# Allegro board LAY-90841_A4.brd
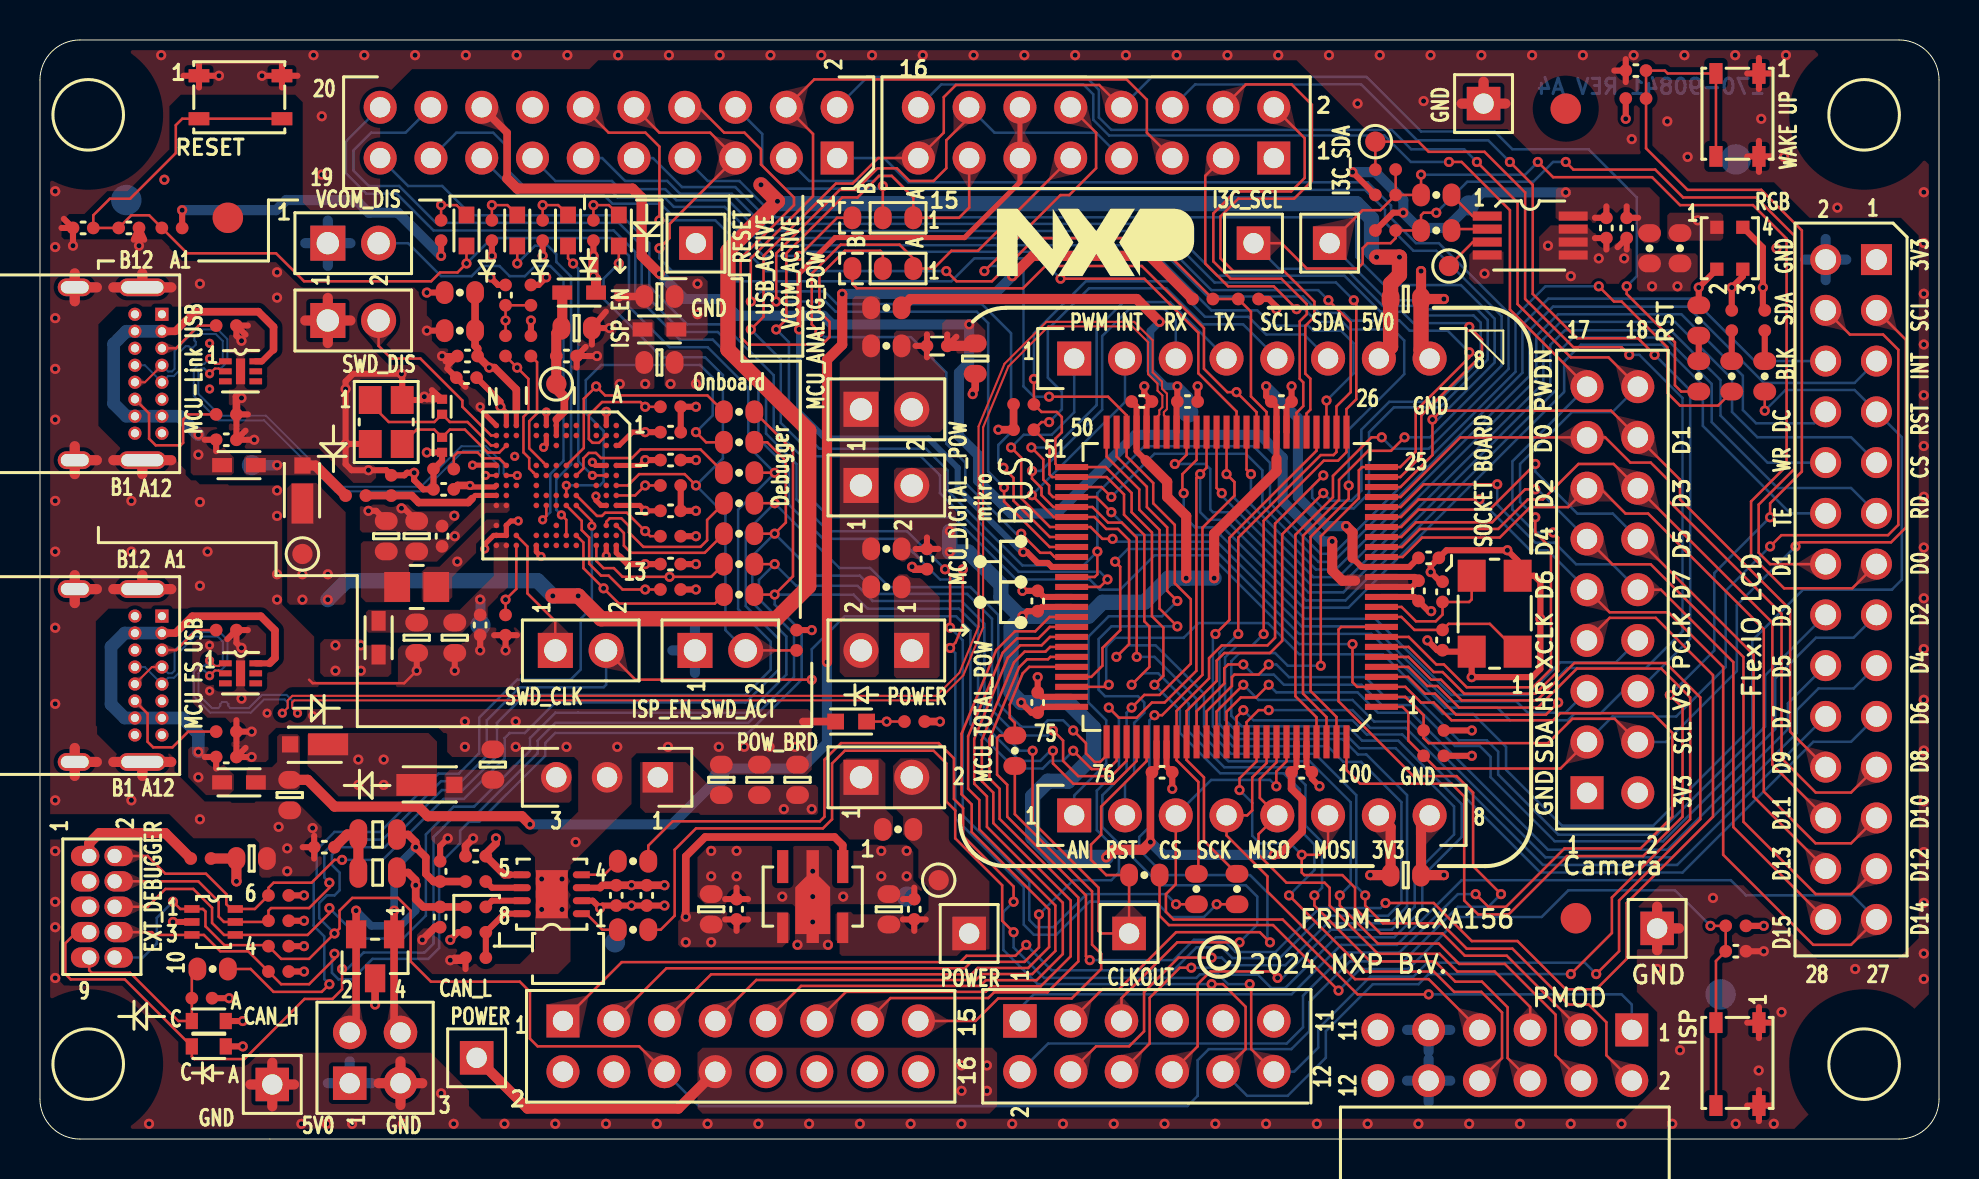
[diagram p0: board, top side]
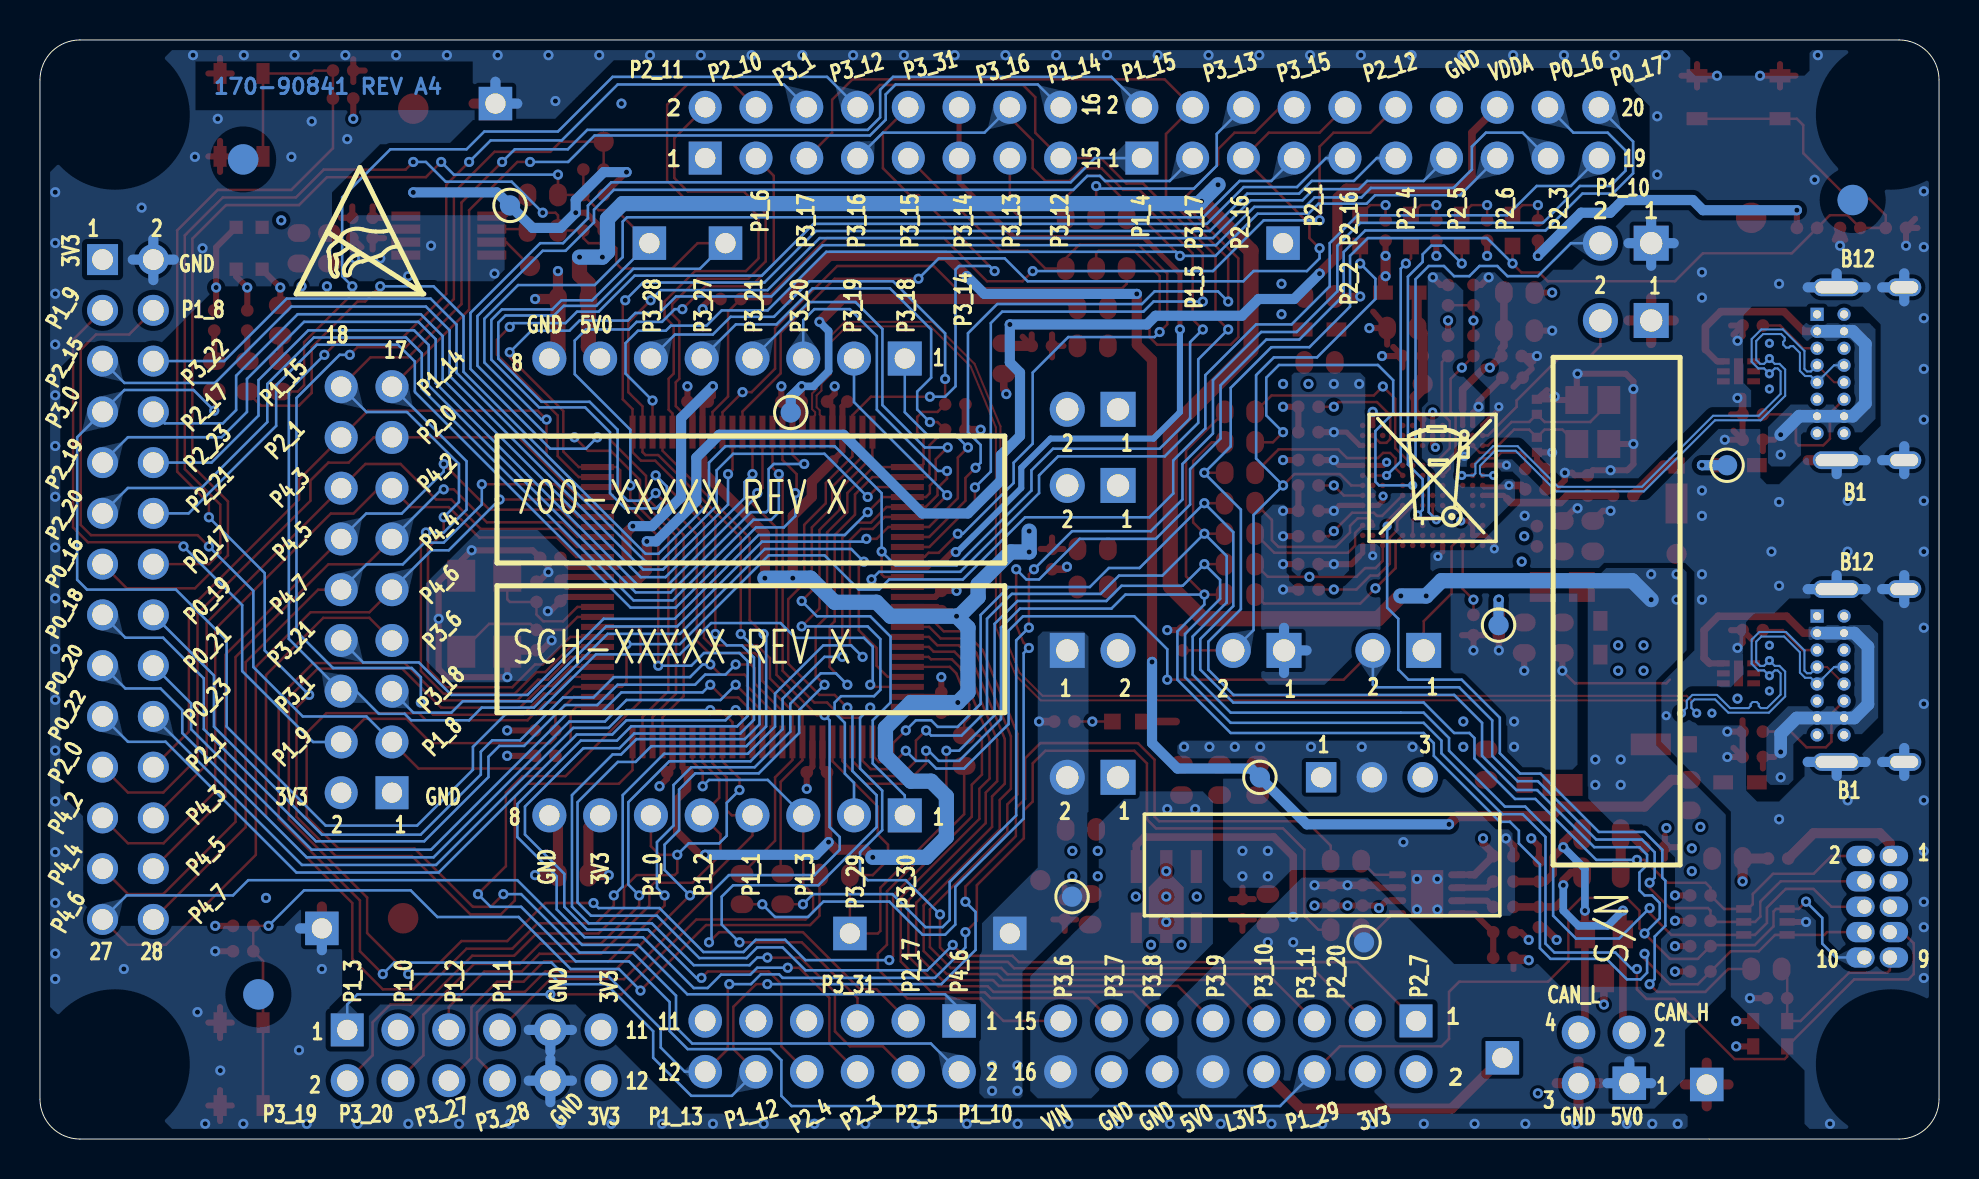
[diagram p1: board, bottom side, seen from below]

Outline 95 x 55 mm; copper layers: TOP, L2_GND, L3_PWR, BOTTOM. Coordinates in mm from the lower left corner of the outline.
Outline path: 0,53 0,2 arc(0.59,0.59) 2,0 93,0 arc(94.41,0.59) 95,2 95,53 arc(94.41,54.41) 93,55 2,55 arc(0.59,54.41) 0,53

## Design rules (mm)
constraint set DEFAULT: min track width 0.127, pair gap 0.127
net group FL_USB1_D: nets FL_USB1_DM FL_USB1_DP
net group P1_12: nets P1_12 P1_12/CAN_RXD
net group USB0_D: nets USB0_DM USB0_DP

## Placement (name value [footprint] x y rotation side)
BH1  125  [MH125-295]  2.41 51.25 0 top
BH2  125  [MH125-295]  2.41 3.75 180 top
BH3  125  [MH125-295]  91.25 3.75 180 top
BH4  125  [MH125-295]  91.25 51.25 0 top
C1  4.7uF  [CC0603_OV]  33.58 11.5 90 top
C2  0.1UF  [CC0402_25]  34.85 11.5 90 top
C3  0.1UF  [CC0402_25]  43.74 11.5 90 top
C4  10uF  [CC0603_OV]  42.47 11.5 90 top
C5  1uF  [CC0402_25]  44.37 29.02 270 top
C6  0.1UF  [CC0402_25]  49.91 26.92 90 top
C7  0.1UF  [CC0402_25]  63.12 18.35 0 top
C8  0.1UF  [CC0402_25]  49.91 21.84 90 top
C9  0.1UF  [CC0402_25]  69.47 29.08 0 top
C10  0.1UF  [CC0402_25]  68.96 27.43 270 top
C11  10uF  [CC0603_OV]  46.78 39.06 270 top
C12  0.1UF  [CC0402_25]  57.4 36.91 0 top
C13  10uF  [CC0603_OV]  30.99 42.16 180 top
C14  10uF  [CC0603_OV]  30.99 38.86 0 top
C15  0.1UF  [CC0402_25]  21.34 38.1 180 top
C16  0.1UF  [CC0402_25]  31.54 31.44 0 top
C17  0.1UF  [CC0402_25]  31.54 28.77 0 top
C18  0.1UF  [CC0402_25]  31.54 33.98 0 top
C19  0.1UF  [CC0402_25]  23.29 42.23 90 top
C20  0.1UF  [CC0402_25]  26.34 39.18 0 top
C21  47pF  [CC0603_OV]  26.85 40.58 0 top
C22  47pF  [CC0603_OV]  18.84 30.17 90 top
C23  0.1UF  [CC0402_25]  20.11 30.17 90 top
C24  22uF  [CC0603_OV]  17.32 30.17 90 top
C25  22uF  [CC0603_OV]  18.84 25.09 270 top
C26  0.1UF  [CC0402_25]  22.02 25.72 270 top
C27  47pF  [CC0603_OV]  20.75 25.09 270 top
C28  12pF  [0402_CC]  20.11 34.74 270 top
C29  12pF  [0402_CC]  20.11 36.64 90 top
C30  0.1UF  [CC0402_25]  31.54 35.37 0 top
C31  0.1UF  [CC0402_25]  20.19 32.51 180 top
C32  2.2UF  [CC0402_25]  9.32 34.99 0 top
C33  0.1UF  [CC0402_25]  21.38 39.18 180 top
C34  10uF  [CC0603_OV]  10.59 14.04 0 top
C35  18pF  [CC0402_25]  70.16 24.97 90 top
C36  1000pF  [CC0402_25]  2.16 45.59 180 top
C37  0.1UF  [CC0402_25]  4.44 45.59 0 top
C38  1000pF  [CC0402_25]  84.84 9.4 0 top
C39  18pF  [CC0402_25]  70.16 27.38 90 top
C40  1000pF  [CC0402_25]  79.84 53.47 180 top
C41  1uF  [CC0402_25]  79.38 45.59 270 top
C42  0.1UF  [CC0402_25]  78.36 45.59 270 top
C43  10uF  [CC0603_OV]  37.89 17.97 90 top
C44  10uF  [CC0603_OV]  35.99 17.97 90 top
C45  10uF  [CC0603_OV]  34.08 17.97 90 top
C46  10uF  [CC0603_OV]  22.65 18.74 90 top
C47  10uF  [CC0603_OV]  68.33 13.21 0 top
C48  10uF  [CC0603_OV]  68.33 42.04 0 top
C49  0.1UF  [CC0402_25]  28.83 12.19 270 top
C50  1uF  [CC0402_25]  30.35 12.19 270 top
C51  1uF  [CC0402_25]  21.8 14.16 180 top
C52  56PF  [CC0402_25]  20.02 11.11 90 top
C53  0.01UF  [CC0402_25]  14.22 14.61 180 top
C54  56PF  [CC0402_25]  20.02 13.39 90 top
C55  4.7uF  [CC0603_OV]  12.49 17.21 270 top
C56  2.2UF  [CC0402_25]  9.32 19.12 0 top
C59  1uF  [CC0402_25]  62.1 36.91 0 top
C60  0.1UF  [CC0402_25]  56.13 18.35 0 top
C61  0.1UF  [CC0402_25]  55.12 36.91 0 top
D1  MSS1P3L  [SMB_2P7X1P4]  13.76 19.75 180 top
D2  MSS1P3L  [SMB_2P7X1P4]  13.13 32.45 90 top
D3  MSS1P3L  [SMB_2P7X1P4]  19.48 17.72 0 top
D4  GREEN  [LED_0603]  40.58 20.89 180 top
D5  GREEN  [LED_0603]  23.88 45.47 270 top
D6  RED  [LED_0603]  28.96 45.47 270 top
D7  GREEN  [LED_0603]  26.42 45.47 270 top
D8  PESD3V3S1UB  [SOD523]  8.45 5.91 0 top
D9  PESD3V3S1UB  [SOD523]  8.45 4.64 0 top
D10  PESD3V3L5UY  [SOT-363_0P65_SMT]  8.68 10.86 0 top
D11  RED  [LED_0603]  21.34 45.47 270 top
D12  RGB  [LED4_2P7X2P6_SM]  84.54 44.58 270 top
D13  NUP2105L  [SOT-23]  16.76 9.14 180 top
J1  CON 2x8  [CON_2X8_SKT_100_TH]  61.72 49.09 180 top
J2  CON 2x10  [CON_SKT2X10_TH]  39.88 49.09 270 top
J3  CON 2x8  [CON_2X8_SKT_100_TH]  26.16 5.91 0 top
J4  CON 2x6  [CON_SKT2X6_TH_126L]  49.02 5.91 180 top
J5  SKT_1X8  [CON_1X8_SKT_2P54_TH_126L]  51.74 39.06 90 top
J6  SKT_1X8  [CON_1X8_SKT_2P54_TH_126L]  51.74 16.2 90 top
J7  PPPC062LJBN-RC  [SKT2X6_100_TH_RA]  79.63 5.46 270 top
J8  CON 2x14  [CON_SKT2X14_TH_126L]  91.87 44.01 0 top
J9  CON_2X9  [CON_SKT2X9_TH_122L]  77.39 17.33 180 top
J10  HDR 1X1  [HDR101]  54.48 10.29 270 top
J11  HDR 1X1  [HDR101]  64.52 44.83 0 top
J12  HDR 1X1  [HDR101]  60.71 44.83 270 top
J14  HDR_1X3  [HDR103]  30.91 18.1 270 top
J15  HDR 1X1  [HDR101]  11.62 2.73 270 top
J16  HDR 1X1  [HDR101]  80.9 10.54 270 top
J17  HDR 1X1  [HDR101]  46.48 10.29 90 top
J18  HDR 1X1  [HDR101]  21.84 4.06 90 top
J19  HDR 1X1  [HDR101]  72.22 51.82 180 top
J20  HDR 1X1  [HDR101]  32.81 44.83 0 top
J21  USB_TYPE_C  [CON16_USB_TYPE-C_RA_TH]  6.1 41.27 270 top
J22  HDR 2X2  [HDR202_100_TH]  15.49 2.79 90 top
J23  USB_TYPE_C  [CON16_USB_TYPE-C_RA_TH]  6.1 26.17 270 top
J24  HDR 2X5  [HDR_5X2_FTSH_TH]  2.46 14.16 0 top
JP1  HDR1X2  [HDR1X2_5P48X2P69]  41.07 18.1 0 top
JP2  HDR1X2  [HDR1X2_5P48X2P69]  41.07 32.71 0 top
JP3  HDR1X2  [HDR1X2_5P48X2P69]  43.61 24.45 180 top
JP4  HDR1X2  [HDR1X2_5P48X2P69]  41.07 36.52 0 top
JP5  HDR1X2  [HDR1X2_5P48X2P69]  32.77 24.45 0 top
JP6  HDR1X2  [HDR1X2_5P48X2P69]  14.4 44.83 0 top
JP7  HDR1X2  [HDR1X2_5P48X2P69]  14.4 40.96 0 top
JP8  HDR1X2  [HDR1X2_5P48X2P69]  25.78 24.45 0 top
L1  120 Ohm  [IND_0402]  44.88 39.69 180 top
L2  600OHM  [IND_1P8X1MM_SM]  30.99 40.51 180 top
L3  600OHM  [IND_1P8X1MM_SM]  26.97 42.36 180 top
L4  600OHM  [IND_1P8X1MM_SM]  16.94 25.09 90 top
L5  4.7uH  [IND_0805]  18.84 27.63 180 top
L6  300Ohms@100MHz  [IND_1P8X1MM_SM]  9.95 33.72 0 top
L8  300Ohms@100MHz  [IND_1P8X1MM_SM]  9.95 17.85 0 top
NOREF  -  []  39.6 11.28 0 top
NOREF#2  -  []  6.1 25.32 90 top
NOREF#3  -  []  0 47.61 0 top
NOREF#4  -  []  3.89 4.33 0 top
NOREF#5  -  []  47.88 43.18 0 top
NOREF#6  -  []  24.31 23.11 0 top
NOREF#7  -  []  6.49 27.77 90 top
NOREF#8  -  []  87.52 5.91 90 top
NOREF#9  -  []  31.3 23.11 0 top
NOREF#10  -  []  94.83 1.2 0 top
NOREF#11  -  []  6.1 40.42 90 top
NOREF#12  -  []  83.84 1.68 90 top
NOREF#13  -  []  -284.3 258.89 0 top
NOREF#14  -  []  12.1 51.06 90 top
NOREF#15  -  []  -2.66 42.87 0 top
NOREF#16  -  []  83.88 43.53 0 top
NOREF#17  -  []  36.36 13.43 0 top
NOREF#18  -  []  3.89 51.83 0 top
NOREF#19  -  []  91.87 41.47 90 top
NOREF#20  -  []  92.73 4.33 0 top
NOREF#21  -  []  41.07 18.1 0 top
NOREF#22  -  []  19.29 -13.82 0 top
NOREF#23  -  []  9.05 17.35 90 top
NOREF#24  -  []  9.11 17.85 0 top
NOREF#25  -  []  84.44 42.51 90 top
NOREF#26  -  [unnamed#2]  9.4 46.1 0 top
NOREF#27  -  []  43.94 3.37 90 top
NOREF#28  -  []  39.6 11.28 90 top
NOREF#29  -  []  26.16 3.37 0 top
NOREF#30  -  []  79.12 50.21 90 top
NOREF#31  -  []  2.41 3.75 0 top
NOREF#32  -  []  65.23 -7.28 0 top
NOREF#33  -  []  2.41 3.75 0 top
NOREF#34  -  []  1.74 33.97 0 top
NOREF#35  -  []  34.94 11.18 0 top
NOREF#36  -  []  91.28 0 90 top
NOREF#37  -  []  43.94 49.09 90 top
NOREF#38  -  []  79.12 53.41 0 top
NOREF#39  -  []  1.74 18.87 90 top
NOREF#40  -  []  31.89 40.01 90 top
NOREF#41  -  []  39.6 25.88 90 top
NOREF#42  -  []  58.99 9.08 0 top
NOREF#43  -  []  16.94 24.24 90 top
NOREF#44  -  []  16.44 24.19 0 top
NOREF#45  -  []  12.93 43.49 0 top
NOREF#46  -  []  83.84 49.17 0 top
NOREF#47  -  []  14.4 40.96 0 top
NOREF#48  -  []  32.77 24.45 0 top
NOREF#49  -  []  29.79 23.11 90 top
NOREF#50  -  []  38.66 12.13 0 top
NOREF#51  -  []  6.49 42.87 90 top
NOREF#52  -  []  9.46 3.75 0 top
NOREF#53  -  [unnamed#2]  76.33 51.56 0 top
NOREF#54  -  []  73.92 24.39 90 top
NOREF#55  -  []  66.78 1.42 0 top
NOREF#56  -  []  124.28 45.65 90 top
NOREF#57  -  []  -310.62 -260.56 0 top
NOREF#58  -  []  83.84 1.68 0 top
NOREF#59  -  []  39.6 25.8 0 top
NOREF#60  -  []  45.08 35.17 90 top
NOREF#61  -  []  4.75 20.22 0 top
NOREF#62  -  []  71.62 28.19 0 top
NOREF#63  -  []  7.87 50.53 90 top
NOREF#64  -  []  9.05 18.35 0 top
NOREF#65  -  []  19.29 -13.82 90 top
NOREF#66  -  []  27.87 41.86 90 top
NOREF#67  -  []  67.82 18.64 0 top
NOREF#68  -  []  43.94 51.63 0 top
NOREF#69  -  []  1.74 18.87 0 top
NOREF#70  -  []  4.75 35.32 0 top
NOREF#71  -  []  7.95 51.06 0 top
NOREF#72  -  []  25.78 24.45 0 top
NOREF#73  -  []  77.09 5.46 0 top
NOREF#74  -  []  39.6 25.88 0 top
NOREF#75  -  []  83.32 5.91 0 top
NOREF#76  -  []  26.07 41.86 0 top
NOREF#77  -  []  65.23 -7.28 90 top
NOREF#78  -  []  1.74 33.97 90 top
NOREF#79  -  []  39.6 35.17 0 top
NOREF#80  -  []  -2.66 27.77 0 top
NOREF#81  -  []  37.16 10.57 90 top
NOREF#82  -  []  41.07 32.71 0 top
NOREF#83  -  []  30.14 40.51 0 top
NOREF#84  -  []  9.11 33.72 0 top
NOREF#85  -  []  83.84 49.17 90 top
NOREF#86  -  []  67.82 18.64 90 top
NOREF#87  -  []  36.78 23.11 90 top
NOREF#88  -  []  30.09 40.01 0 top
NOREF#89  -  []  28.7 3.37 0 top
NOREF#90  -  []  36.36 10.83 90 top
NOREF#91  -  []  9.05 33.22 90 top
NOREF#92  -  []  88.67 50.9 0 top
NOREF#93  -  []  41.07 24.45 0 top
NOREF#94  -  []  4.67 54.73 0 top
NOREF#95  -  []  92.73 51.83 0 top
NOREF#96  -  []  9.05 34.22 0 top
NOREF#97  -  []  -15.34 -151.34 0 top
NOREF#98  -  []  80.59 45.93 0 top
NOREF#99  -  []  80.59 43.43 90 top
NOREF#100  -  []  16.44 24.19 90 top
NOREF#101  -  []  63.37 42.51 0 top
NOREF#102  -  []  74.19 -36.41 0 top
NOREF#103  -  [unnamed#2]  76.84 11.05 0 top
NOREF#104  -  []  14.4 44.83 0 top
NOREF#105  -  []  56.64 51.63 0 top
NOREF#106  -  []  41.07 36.52 0 top
NOREF#107  -  []  18.41 39.62 90 top
NOREF#108  -  []  91.87 10.99 90 top
NOREF#109  -  []  39.6 23.11 90 top
NOREF#110  -  []  66.93 2.92 90 top
NOREF#111  -  []  12.93 39.62 0 top
NOREF#112  -  []  18.41 43.49 90 top
NOREF#113  -  []  85.19 43.53 90 top
NOREF#114  -  []  26.13 42.36 0 top
NOREF#115  -  [unnamed#2]  84.84 49.02 180 bottom
NOREF#116  -  []  82.17 42.29 180 bottom
NOREF#117  -  []  72.14 21.34 180 bottom
NOREF#118  -  []  13.08 13.72 90 bottom
NOREF#119  -  []  21.97 16.26 0 bottom
NOREF#120  -  [unnamed#2]  4.32 46.99 180 bottom
NOREF#121  -  [unnamed#2]  84.07 7.24 180 bottom
NOREF#122  -  []  28.51 29.91 180 bottom
NOREF#123  -  []  72.14 28.83 180 bottom
R4  0  [RC0603_OV]  42.93 15.49 180 top
R5  0  [RC0603_OV]  42.34 29.53 0 top
R6  2.7  [RC0603_OV]  42.34 27.63 180 top
R7  0  [RC0603_OV]  42.34 39.69 0 top
R8  10K  [RC0402_25]  58.17 42.04 0 top
R9  0  [RC0603_OV]  42.34 41.6 0 top
R10  20K  [RC0402_25]  60.45 42.04 0 top
R11  470  [RC0402_25]  43.75 20.89 180 top
R12  10K  [RC0402_25]  24.56 42.23 270 top
R13  100  [RC0402_25]  23.29 39.69 270 top
R14  510  [RC0402_25]  22.61 45.47 90 top
R15  510  [RC0402_25]  27.69 45.47 90 top
R16  510  [RC0402_25]  25.15 45.47 90 top
R17  10K  [RC0402_25]  15.8 32.2 0 top
R18  5.1K  [RC0402_25]  9.32 40.71 0 top
R19  5.1K  [RC0402_25]  9.32 36.26 0 top
R20  20K  [RC0402_25]  17.57 32.71 90 top
R23  2.0K  [RC0603_OV]  21 42.36 0 top
R24  2.0K  [RC0603_OV]  21 40.45 180 top
R25  100K  [RC0402_25]  37.85 24.96 270 top
R26  1K  [RC0402_25]  23.29 25.72 270 top
R27  1K  [RC0402_25]  31.54 30.17 0 top
R28  1K  [RC0402_25]  31.54 32.71 0 top
R29  1K  [RC0402_25]  31.54 27.5 0 top
R30  1K  [RC0402_25]  31.54 36.64 0 top
R31  1K  [RC0402_25]  20.19 33.53 180 top
R32  1K  [RC0402_25]  24.56 39.69 90 top
R33  0  [RC0603_OV]  34.97 31.82 180 top
R34  0  [RC0603_OV]  34.97 33.34 180 top
R35  0  [RC0603_OV]  34.97 28.77 180 top
R36  0  [RC0603_OV]  34.97 34.87 180 top
R37  0  [RC0603_OV]  34.97 36.39 180 top
R38  100  [RC0402_25]  8.05 14.04 180 top
R39  100K  [RC0402_25]  11.94 12.19 180 top
R40  100K  [RC0402_25]  11.94 8.38 180 top
R41  100K  [RC0402_25]  11.94 9.65 180 top
R42  2.0K  [RC0603_OV]  8.64 8.51 180 top
R43  100K  [RC0402_25]  11.94 10.92 0 top
R44  2.2K  [RC0402_25]  8.1 7.05 0 top
R45  220  [RC0603_OV]  34.97 30.29 0 top
R46  0  [RC0603_OV]  34.97 27.25 0 top
R47  10K  [RC0402_25]  6.6 45.59 180 top
R48  10K  [RC0402_25]  84.84 10.67 180 top
R49  470  [RC0402_25]  20.07 45.47 90 top
R50  10K  [RC0402_25]  79.84 52.07 0 top
R51  0  [RC0603_OV]  80.52 44.58 90 top
R52  680  [RC0603_OV]  82.98 40.96 270 top
R53  0  [RC0603_OV]  82.04 44.58 90 top
R54  1K  [RC0402_25]  67.31 48.51 0 top
R55  2.2K  [RC0402_25]  67.31 47.24 0 top
R56  470  [RC0402_25]  84.63 40.96 270 top
R57  2.2K  [RC0402_25]  67.31 45.47 0 top
R58  470  [RC0402_25]  86.28 40.96 270 top
R59  0  [R603-X2]  42.93 46.1 180 top
R60  0  [R603-X2]  42.93 43.56 180 top
R63  10K  [RC0402_25]  21.8 10.35 0 top
R64  0  [RC0402_25]  21.8 11.62 0 top
R66  62  [RC0805_OV]  16.89 13.34 180 top
R67  100K  [RC0402_25]  21.8 9.08 180 top
R68  62  [RC0805_OV]  16.89 15.24 0 top
R69  0  [RC0402_25]  21.8 12.89 0 top
R70  5.1K  [RC0402_25]  9.32 25.47 0 top
R71  5.1K  [RC0402_25]  9.32 20.39 0 top
R72  0  [RC0603_OV]  86.28 38.17 90 top
R73  0  [RC0603_OV]  82.98 38.17 90 top
R74  0  [RC0603_OV]  84.63 38.17 90 top
R75  0  [RC0603_OV]  29.67 13.9 180 top
R76  0  [RC0603_OV]  29.67 10.47 180 top
R77  0  [RC0603_OV]  69.85 47.24 0 top
R78  0  [RC0603_OV]  69.85 45.47 0 top
R79  4.7K  [RC0402_25]  69.72 20.45 180 top
R80  4.7K  [RC0402_25]  69.72 19.18 180 top
R83  0  [RC0603_OV]  48.77 19.43 270 top
R84  0  [RC0603_OV]  55.24 13.21 0 top
R85  4.7K  [RC0402_25]  49.21 35.5 0 top
R86  4.7K  [RC0402_25]  49.21 36.77 0 top
R87  0  [RC0603_OV]  57.85 12.51 270 top
R88  0  [RC0603_OV]  59.88 12.51 270 top
SW1  434123025826  [SW4_4P15_4P2X3P2_SM]  9.97 52.13 0 top
SW2  434123025826  [SW4_4P15_4P2X3P2_SM]  84.92 51.31 270 top
SW3  434123025826  [SW4_4P15_4P2X3P2_SM]  84.92 3.81 270 top
TP1  -  [TPAD_040]  13.13 29.28 180 top
TP2  -  [TPAD_040]  44.96 12.95 0 top
TP3  -  [TPAD_040]  66.8 49.91 270 top
TP4  -  [TPAD_040]  70.48 43.69 270 top
TP5  -  [TPAD_040]  57.44 36.36 180 bottom
TP6  -  [TPAD_040]  25.83 37.79 0 top
TP7  -  [TPAD_040]  22.03 25.72 180 bottom
TP8  -  [TPAD_040]  10.6 33.72 180 bottom
TP9  -  [TPAD_040]  71.49 46.72 180 bottom
TP10  -  [TPAD_040]  33.97 18.1 180 bottom
TP11  -  [TPAD_040]  28.77 9.84 180 bottom
TP12  -  [TPAD_040]  43.37 12.13 180 bottom
U2  XC6227C331PR-G  [SOT89-5]  38.66 12.13 180 top
U3  LPC55S69JEV98  [BGA98_0P5_7X7]  25.83 32.71 270 top
U4  RClamp0854P.TCT  [SLP1616P6]  10.03 38.42 270 top
U5  P3T1755DP  [TSSOP8_A]  74.55 45.21 0 top
U6  TJA1057GTK/3Z  [SON8_0P65_3P15X3P15]  25.61 12.25 180 top
U7  RClamp0854P.TCT  [SLP1616P6]  10.03 23.3 270 top
U8  MCX A156VLL  [LQFP100_0P5_14X14]  59.36 27.63 180 top
Y1  16MHz  [XTAL4_3P4X2P7_SM]  17.32 35.88 270 top
Y2  8.0MHz  [XTLOSC4_5P1X3P3MM]  72.77 26.29 90 top

## Library data of the parts
BH1-BH4 = MOUNT_HOLE: room: FRDM-MCXA156/04 POWER
C1-C12 = CAP_NP: room: FRDM-MCXA156/04 POWER
C13-C33 = CAP_NP: room: FRDM-MCXA156/05 MCU_LINK_USB
C34 = CAP_NP: room: FRDM-MCXA156/06 MCU_LINK_DEBUG
C35-C42 = CAP_NP: room: FRDM-MCXA156/07 CLOCK_RESET_HMI
C43-C48 = CAP_NP: room: FRDM-MCXA156/08 HEADERS
C49-C52 C54-C56 = CAP_NP: room: FRDM-MCXA156/09 CAN_USB
C53 = CAP_NP: tolerance: 20%; room: FRDM-MCXA156/09 CAN_USB
C59-C61 = CAP_NP
D1-D3 = DIODE_SCHTKY: room: FRDM-MCXA156/04 POWER
D4 = LED: room: FRDM-MCXA156/04 POWER
D5-D7 = LED: room: FRDM-MCXA156/05 MCU_LINK_USB
D8 D9 = DIODE_TVS: room: FRDM-MCXA156/06 MCU_LINK_DEBUG
D10 = DIODE_ARRAY_5CH: room: FRDM-MCXA156/06 MCU_LINK_DEBUG
D11 = LED: room: FRDM-MCXA156/07 CLOCK_RESET_HMI
D12 = LRTBR48G_4P: room: FRDM-MCXA156/07 CLOCK_RESET_HMI
D13 = DIODE_NUP2105L: room: FRDM-MCXA156/09 CAN_USB
J1 J3 = CONN_HDR_8X2: room: FRDM-MCXA156/08 HEADERS
J2 = CONN_HDR_10X2: room: FRDM-MCXA156/08 HEADERS
J4 = CONN_HDR_6X2: room: FRDM-MCXA156/08 HEADERS
J5 = CONN_HDR_8X1: room: FRDM-MCXA156/03 MCU
J6 = CONN_HDR_8X1: room: FRDM-MCXA156/04 POWER
J7 = CONN_HDR_6X2: room: FRDM-MCXA156/04 POWER
J8 = CONN_HDR_14X2: room: FRDM-MCXA156/05 MCU_LINK_USB
J9 = CONN_HDR_9X2: room: FRDM-MCXA156/06 MCU_LINK_DEBUG
J10-J12 = CONN_HDR_1X1: room: FRDM-MCXA156/07 CLOCK_RESET_HMI
J14 = CONN_HDR_3X1: room: FRDM-MCXA156/08 HEADERS
J15 J16 J19 J20 = CONN_HDR_1X1: room: FRDM-MCXA156/04 POWER
J17 J18 = CONN_HDR_1X1: room: FRDM-MCXA156/08 HEADERS
J21 = USB16_TYPEC_4SH: room: FRDM-MCXA156/08 HEADERS
J22 = CONN_HDR_2X2: room: FRDM-MCXA156/09 CAN_USB
J23 = USB16_TYPEC_4SH: room: FRDM-MCXA156/09 CAN_USB
J24 = CONN_HDR_5X2: room: FRDM-MCXA156/08 HEADERS
JP1-JP4 = CONN_HDR_2X1: room: FRDM-MCXA156/04 POWER
JP5-JP7 = CONN_HDR_2X1: room: FRDM-MCXA156/05 MCU_LINK_USB
JP8 = CONN_HDR_2X1: room: FRDM-MCXA156/06 MCU_LINK_DEBUG
L1 = INDUCTOR_FERRITE: room: FRDM-MCXA156/04 POWER
L2-L6 = INDUCTOR: room: FRDM-MCXA156/05 MCU_LINK_USB
L8 = INDUCTOR: room: FRDM-MCXA156/09 CAN_USB
R4-R10 = RES: room: FRDM-MCXA156/04 POWER
R11 = RES: tolerance: 1%; room: FRDM-MCXA156/04 POWER
R12-R20 R23-R32 = RES: room: FRDM-MCXA156/05 MCU_LINK_USB
R33-R46 = RES: room: FRDM-MCXA156/06 MCU_LINK_DEBUG
R47 R48 R50-R55 R57 R77 R78 = RES: room: FRDM-MCXA156/07 CLOCK_RESET_HMI
R49 R56 R58 = RES: tolerance: 1%; room: FRDM-MCXA156/07 CLOCK_RESET_HMI
R59 R60 = RES_3PIN: Tolerance: X; User Part Number: 470-80866; room: FRDM-MCXA156/08 HEADERS
R63 R64 R66 R68 R69 = RES: room: FRDM-MCXA156/09 CAN_USB
R67 = RES: tolerance: 5%; room: FRDM-MCXA156/09 CAN_USB
R70 R71 = RES: room: FRDM-MCXA156/09 CAN_USB; signal model: RES_RC0402
R72-R74 R76 = RES: room: FRDM-MCXA156/03 MCU
R75 R79 R80 = RES: room: FRDM-MCXA156/03 MCU; signal model: RES_RC0402
R83-R88 = RES
SW1-SW3 = SW_PSHBT_SPST_2: room: FRDM-MCXA156/07 CLOCK_RESET_HMI
TP1 TP2 = TestLoop: room: FRDM-MCXA156/04 POWER
TP3 TP4 = TestLoop: room: FRDM-MCXA156/07 CLOCK_RESET_HMI
TP5-TP12 = TestLoop
U2 = XC6227C_5P: room: FRDM-MCXA156/04 POWER
U3 = NIOBE4_MINI_FBGA98
U4 = RCLAMP1654P_NEW: room: FRDM-MCXA156/05 MCU_LINK_USB
U5 = P3T2175DP_TSSOP8: room: FRDM-MCXA156/07 CLOCK_RESET_HMI
U6 = TJA1051TK_3_HVSON8: room: FRDM-MCXA156/09 CAN_USB
U7 = RCLAMP1654P_NEW: room: FRDM-MCXA156/09 CAN_USB
U8 = MCXA18_LQFP100
Y1 = XTAL_4P_B: room: FRDM-MCXA156/05 MCU_LINK_USB
Y2 = XTAL_4P_830055663: room: FRDM-MCXA156/07 CLOCK_RESET_HMI

## Footprints (pads in the part's own frame, mm; a bottom-side part is the same pattern mirrored in y, then rotated)
0402_CC
  rect 0.457x0.508 smd: 1(-0.375,0) 2(0.375,0)
BGA98_0P5_7X7
  round 0.279 smd: A1(-3,3) A2(-2.5,3) A3(-2,3) A5(-1,3) A6(-0.5,3) A7(0,3) A8(0.5,3) A9(1,3) A11(2,3) A12(2.5,3) A13(3,3) B1(-3,2.5) B2(-2.5,2.5) B3(-2,2.5) B5(-1,2.5) B6(-0.5,2.5) B7(0,2.5) B8(0.5,2.5) B9(1,2.5) B11(2,2.5) B12(2.5,2.5) B13(3,2.5) C1(-3,2) C2(-2.5,2) C7(0,2) C12(2.5,2) C13(3,2) E1(-3,1) E2(-2.5,1) E5(-1,1) E6(-0.5,1) E7(0,1) E8(0.5,1) E9(1,1) E12(2.5,1) E13(3,1) F1(-3,0.5) F2(-2.5,0.5) F5(-1,0.5) F6(-0.5,0.5) F8(0.5,0.5) F9(1,0.5) F12(2.5,0.5) F13(3,0.5) G1(-3,0) G2(-2.5,0) G3(-2,0) G5(-1,0) G6(-0.5,0) G8(0.5,0) G9(1,0) G11(2,0) G12(2.5,0) G13(3,0) H1(-3,-0.5) H2(-2.5,-0.5) H5(-1,-0.5) H6(-0.5,-0.5) H8(0.5,-0.5) H9(1,-0.5) H12(2.5,-0.5) H13(3,-0.5) J1(-3,-1) J2(-2.5,-1) J5(-1,-1) J6(-0.5,-1) J7(0,-1) J8(0.5,-1) J9(1,-1) J12(2.5,-1) J13(3,-1) L1(-3,-2) L2(-2.5,-2) L7(0,-2) L12(2.5,-2) L13(3,-2) M1(-3,-2.5) M2(-2.5,-2.5) M3(-2,-2.5) M5(-1,-2.5) M6(-0.5,-2.5) M7(0,-2.5) M8(0.5,-2.5) M9(1,-2.5) M11(2,-2.5) M12(2.5,-2.5) M13(3,-2.5) N1(-3,-3) N2(-2.5,-3) N3(-2,-3) N5(-1,-3) N6(-0.5,-3) N7(0,-3) N8(0.5,-3) N9(1,-3) N11(2,-3) N12(2.5,-3) N13(3,-3)
CC0402_25
  round 0.635 smd: 1(-0.508,0) 2(0.508,0)
CC0603_OV
  oval 0.889x1.143 smd: 1(-0.762,0) 2(0.762,0)
CON16_USB_TYPE-C_RA_TH
  rect 0.66x0.66 hole 0.406: A1(0,0)
  round 0.66 hole 0.406: A4(0.85,0) A5(1.7,0) A6(2.55,0) A7(3.4,0) A8(4.25,0) A9(5.1,0) A12(5.95,0) B1(5.95,-1.35) B4(5.1,-1.35) B5(4.25,-1.35) B6(3.4,-1.35) B7(2.55,-1.35) B8(1.7,-1.35) B9(0.85,-1.35) B12(0,-1.35)
  oval 0.889x2.388 hole 0.61x2.108: SH1(-1.35,-0.98) SH2(7.3,-0.98)
  oval 0.889x1.702 hole 0.61x1.397: SH3(-1.35,-4.36) SH4(7.3,-4.36)
CON_1X8_SKT_2P54_TH_126L
  rect 1.702x1.702 hole 1.016: 1(0,0)
  round 1.702 hole 1.016: 2(0,-2.54) 3(0,-5.08) 4(0,-7.62) 5(0,-10.16) 6(0,-12.7) 7(0,-15.24) 8(0,-17.78)
CON_2X8_SKT_100_TH
  rect 1.651x1.651 hole 1.016: 1(0,0)
  round 1.651 hole 1.016: 2(0,-2.54) 3(2.54,0) 4(2.54,-2.54) 5(5.08,0) 6(5.08,-2.54) 7(7.62,0) 8(7.62,-2.54) 9(10.16,0) 10(10.16,-2.54) 11(12.7,0) 12(12.7,-2.54) 13(15.24,0) 14(15.24,-2.54) 15(17.78,0) 16(17.78,-2.54)
CON_SKT2X6_TH_126L
  rect 1.676x1.676 hole 1.041: 1(0,0)
  round 1.676 hole 1.041: 2(0,2.54) 3(-2.54,0) 4(-2.54,2.54) 5(-5.08,0) 6(-5.08,2.54) 7(-7.62,0) 8(-7.62,2.54) 9(-10.16,0) 10(-10.16,2.54) 11(-12.7,0) 12(-12.7,2.54)
CON_SKT2X9_TH_122L
  rect 1.651x1.651 hole 1.016: 1(0,0)
  round 1.651 hole 1.016: 2(-2.54,0) 3(0,-2.54) 4(-2.54,-2.54) 5(0,-5.08) 6(-2.54,-5.08) 7(0,-7.62) 8(-2.54,-7.62) 9(0,-10.16) 10(-2.54,-10.16) 11(0,-12.7) 12(-2.54,-12.7) 13(0,-15.24) 14(-2.54,-15.24) 15(0,-17.78) 16(-2.54,-17.78) 17(0,-20.32) 18(-2.54,-20.32)
CON_SKT2X10_TH
  rect 1.651x1.651 hole 1.016: 1(0,0)
  round 1.651 hole 1.016: 2(-2.54,0) 3(0,-2.54) 4(-2.54,-2.54) 5(0,-5.08) 6(-2.54,-5.08) 7(0,-7.62) 8(-2.54,-7.62) 9(0,-10.16) 10(-2.54,-10.16) 11(0,-12.7) 12(-2.54,-12.7) 13(0,-15.24) 14(-2.54,-15.24) 15(0,-17.78) 16(-2.54,-17.78) 17(0,-20.32) 18(-2.54,-20.32) 19(0,-22.86) 20(-2.54,-22.86)
CON_SKT2X14_TH_126L
  rect 1.549x1.549 hole 1.041: 1(0,0)
  round 1.549 hole 1.041: 2(-2.54,0) 3(0,-2.54) 4(-2.54,-2.54) 5(0,-5.08) 6(-2.54,-5.08) 7(0,-7.62) 8(-2.54,-7.62) 9(0,-10.16) 10(-2.54,-10.16) 11(0,-12.7) 12(-2.54,-12.7) 13(0,-15.24) 14(-2.54,-15.24) 15(0,-17.78) 16(-2.54,-17.78) 17(0,-20.32) 18(-2.54,-20.32) 19(0,-22.86) 20(-2.54,-22.86) 21(0,-25.4) 22(-2.54,-25.4) 23(0,-27.94) 24(-2.54,-27.94) 25(0,-30.48) 26(-2.54,-30.48) 27(0,-33.02) 28(-2.54,-33.02)
HDR1X2_5P48X2P69
  rect 1.753x1.753 hole 1.118: 1(0,0)
  round 1.753 hole 1.118: 2(2.54,0)
HDR101
  rect 1.676x1.676 hole 1.016: 1(0,0)
HDR103
  rect 1.524x1.524 hole 1.016: 1(0,0)
  round 1.524 hole 1.016: 2(0,-2.54) 3(0,-5.08)
HDR202_100_TH
  rect 1.676x1.676 hole 1.016: 1(0,0)
  round 1.676 hole 1.016: 2(2.54,0) 3(0,-2.54) 4(2.54,-2.54)
HDR_5X2_FTSH_TH
  oval 1.422x1.016 hole 0.711: 1(0,0) 2(1.27,0) 3(0,-1.27) 4(1.27,-1.27) 5(0,-2.54) 6(1.27,-2.54) 7(0,-3.81) 8(1.27,-3.81) 9(0,-5.08) 10(1.27,-5.08)
IND_1P8X1MM_SM
  rect 0.991x0.711 smd: 1(-0.845,0) 2(0.845,0)
IND_0402
  round 0.635 smd: 1(-0.508,0) 2(0.508,0)
IND_0805
  rect 1.295x1.499 smd: 1(-0.978,0) 2(0.978,0)
LED4_2P7X2P6_SM
  rect 0.66x0.66 smd: 1(-1.049,-0.65) 2(1.049,-0.65) 3(1.049,0.65) 4(-1.049,0.65)
LED_0603
  rect 0.838x0.787 smd: A(-0.775,0) C(0.775,0)
LQFP100_0P5_14X14
  rect 1.651x0.305 smd: 1(-7.75,6) 2(-7.75,5.5) 3(-7.75,5) 4(-7.75,4.5) 5(-7.75,4) 6(-7.75,3.5) 7(-7.75,3) 8(-7.75,2.5) 9(-7.75,2) 10(-7.75,1.5) 11(-7.75,1) 12(-7.75,0.5) 13(-7.75,0) 14(-7.75,-0.5) 15(-7.75,-1) 16(-7.75,-1.5) 17(-7.75,-2) 18(-7.75,-2.5) 19(-7.75,-3) 20(-7.75,-3.5) 21(-7.75,-4) 22(-7.75,-4.5) 23(-7.75,-5) 24(-7.75,-5.5) 25(-7.75,-6) 51(7.75,-6) 52(7.75,-5.5) 53(7.75,-5) 54(7.75,-4.5) 55(7.75,-4) 56(7.75,-3.5) 57(7.75,-3) 58(7.75,-2.5) 59(7.75,-2) 60(7.75,-1.5) 61(7.75,-1) 62(7.75,-0.5) 63(7.75,0) 64(7.75,0.5) 65(7.75,1) 66(7.75,1.5) 67(7.75,2) 68(7.75,2.5) 69(7.75,3) 70(7.75,3.5) 71(7.75,4) 72(7.75,4.5) 73(7.75,5) 74(7.75,5.5) 75(7.75,6)
  rect 0.305x1.651 smd: 26(-6,-7.75) 27(-5.5,-7.75) 28(-5,-7.75) 29(-4.5,-7.75) 30(-4,-7.75) 31(-3.5,-7.75) 32(-3,-7.75) 33(-2.5,-7.75) 34(-2,-7.75) 35(-1.5,-7.75) 36(-1,-7.75) 37(-0.5,-7.75) 38(0,-7.75) 39(0.5,-7.75) 40(1,-7.75) 41(1.5,-7.75) 42(2,-7.75) 43(2.5,-7.75) 44(3,-7.75) 45(3.5,-7.75) 46(4,-7.75) 47(4.5,-7.75) 48(5,-7.75) 49(5.5,-7.75) 50(6,-7.75) 76(6,7.75) 77(5.5,7.75) 78(5,7.75) 79(4.5,7.75) 80(4,7.75) 81(3.5,7.75) 82(3,7.75) 83(2.5,7.75) 84(2,7.75) 85(1.5,7.75) 86(1,7.75) 87(0.5,7.75) 88(0,7.75) 89(-0.5,7.75) 90(-1,7.75) 91(-1.5,7.75) 92(-2,7.75) 93(-2.5,7.75) 94(-3,7.75) 95(-3.5,7.75) 96(-4,7.75) 97(-4.5,7.75) 98(-5,7.75) 99(-5.5,7.75) 100(-6,7.75)
MH125-295
  round 0 hole 3.175 unplated: (0,0)
R603-X2
  oval 0.889x1.143 smd: 1(-0.762,0) 2(0.762,0) 3(2.286,0)
RC0402_25
  round 0.635 smd: 1(-0.508,0) 2(0.508,0)
RC0603_OV
  oval 0.889x1.143 smd: 1(-0.762,0) 2(0.762,0)
RC0805_OV
  oval 0.889x1.524 smd: 1(-0.965,0) 2(0.965,0)
SKT2X6_100_TH_RA
  rect 1.651x1.651 hole 1.016: 1(0,0)
  round 1.651 hole 1.016: 2(2.54,0) 3(0,-2.54) 4(2.54,-2.54) 5(0,-5.08) 6(2.54,-5.08) 7(0,-7.62) 8(2.54,-7.62) 9(0,-10.16) 10(2.54,-10.16) 11(0,-12.7) 12(2.54,-12.7)
SLP1616P6
  rect 0.305x0.635 smd: 1(-0.5,-0.76) 2(0,-0.76) 3(0.5,-0.76) 4(0.5,0.76) 5(0,0.76) 6(-0.5,0.76)
  rect 1.295x0.457 smd: 7(0,0)
SMB_2P7X1P4
  rect 0.813x0.813 smd: A(1.25,0)
  rect 2.007x1.092 smd: C(-0.65,0)
SOD523
  rect 0.61x0.813 smd: A(0.85,0) C(-0.85,0)
SON8_0P65_3P15X3P15
  custom 0.85x0.35 smd: 1(-1.475,0.975) 2(-1.475,0.325) 3(-1.475,-0.325) 4(-1.475,-0.975) 5(1.475,-0.975) 6(1.475,-0.325) 7(1.475,0.325) 8(1.475,0.975)
  rect 1.6x2.413 smd: 9(0,0)
SOT89-5
  rect 0.559x1.651 smd: 1(-1.501,-1.501) 3(1.501,-1.501)
  custom 1.748x4.648 smd: 2(0,0)
  rect 0.559x1.524 smd: 4(1.501,1.565) 5(-1.501,1.565)
SOT-23
  rect 1.016x1.397 smd: 1(-0.95,-1.1) 2(0.95,-1.1) 3(0,1.1)
SOT-363_0P65_SMT
  rect 0.762x0.381 smd: 1(-1.085,0.65) 2(-1.085,0) 3(-1.085,-0.65) 4(1.085,-0.65) 5(1.085,0) 6(1.085,0.65)
SW4_4P15_4P2X3P2_SM
  rect 1.041x0.66 smd: 1(-2.015,1.075) 2(2.135,1.075) 3(-2.015,-1.075) 4(2.135,-1.075)
TPAD_040
  round 1.016 smd: 1(0,0)
TSSOP8_A
  rect 1.448x0.457 smd: 1(-2.15,0.975) 2(-2.15,0.325) 3(-2.15,-0.325) 4(-2.15,-0.975) 5(2.15,-0.975) 6(2.15,-0.325) 7(2.15,0.325) 8(2.15,0.975)
unnamed#2
  round 1.524 smd: (0,0)
XTAL4_3P4X2P7_SM
  rect 1.397x1.143 smd: 1(-1.1,-0.8) 2(1.1,-0.8) 3(1.1,0.8) 4(-1.1,0.8)
XTLOSC4_5P1X3P3MM
  rect 1.6x1.397 smd: 1(-1.9,-1.15) 2(1.9,-1.15) 3(1.9,1.15) 4(-1.9,1.15)

## Nets
GND: C1.2 C2.2 C3.2 C4.2 C5.2 C6.2 C7.2 C8.2 C9.2 C10.2 C11.2 C12.2 C13.2 C14.2 C15.2 C16.2 C17.2 C18.2 C19.2 C20.2 C21.2 C22.2 C23.2 C24.2 C25.2 C26.2 C27.2 C28.2 C29.2 C30.2 C31.2 C32.2 C33.2 C34.2 C35.1 C36.2 C37.2 C38.2 C39.2 C40.2 C41.2 C42.2 C43.2 C44.2 C45.2 C46.2 C47.2 C48.2 C49.2 C50.2 C51.2 C52.1 C53.2 C54.2 C55.2 C56.2 C59.2 C60.2 C61.2 D4.C(CATHODE) D8.A D9.A D10.2 D13.3 J2.14 J3.12 J3.14 J5.8 J6.8 J7.9 J7.10 J8.2 J9.1 J14.2 J15.1 J16.1 J19.1 J20.1 J21.A1 J21.A12 J21.B1 J21.B12 J21.SH1 J21.SH2 J21.SH3 J21.SH4 J22.3 J23.A1 J23.A12 J23.B1 J23.B12 J23.SH1 J23.SH2 J23.SH3 J23.SH4 J24.3 J24.5 JP5.1 JP6.1 JP7.1 R10.2 R18.2 R19.2 R20.2 R24.2 R26.2 R27.2 R28.2 R29.2 R30.2 R31.2 R32.2 R43.2 R44.2 R67.2 R70.2 R71.2 SW1.1 SW1.2 SW2.1 SW2.2 SW3.1 SW3.2 U2.2(VSS) U3.B1 U3.B5 U3.B9 U3.B13 U3.H1 U3.H2 U3.J13 U3.M11 U3.M12 U3.N1 U3.N5 U3.N12 U4.7 U5.4 U5.5 U5.6 U5.7 U6.2 U6.9 U7.7 U8.12 U8.32 U8.46 U8.64 U8.74 U8.82 U8.96(VSS_7) Y1.2 Y1.4 Y2.2 Y2.4(GND/LID_2)
P5V_HDR_IN: C46.1 D3.A J14.3
P5V_MCU_LINK_USB: D2.A L6.2 R17.1 TP8.1(PIN1)
P5V_USB_FS: C55.1 D1.A L8.2 R8.1 TP10.1(PIN1)
VBAT_DCDC/VBAT_PMU: C25.1 C26.1 C27.1 L4.2 TP7.1(PIN1) U3.M13 U3.N13
VDD_BOARD: C13.1 C34.1 C47.1 C51.1 J3.4 J6.7 J7.11 J7.12(B6) J8.1 J9.2 JP1.1 L2.1 L3.1 L4.1 R4.2 R14.1 R15.1 R16.1 R23.1 R25.1 R38.1 R39.1 R40.1 R41.1 R47.1 R48.1 R49.1 R50.1 R51.1 R53.1 R63.1 R79.1 R80.1 R85.1 R86.1 U6.5(VIO)
VDD_MCU: C5.1 C6.1 C7.1 C8.1 C9.1 C59.1 C60.1 C61.1 JP2.2 R5.2 U8.15 U8.33 U8.47 U8.65 U8.75 U8.81 U8.95
VDD_P3T: C41.1 C42.1 R51.2 R55.1 R57.1 TP9.1(PIN1) U5.8(VCC)
VDD_USB: C12.1 R9.2 TP5.1(PIN1) U8.43
VDDA_MCU: C10.1 C11.1 J2.16 L1.1 U8.13 U8.14
CAN_H: C52.2 D13.2(CATHODE2) J22.2 R64.1 R66.1
CAN_H_R: R64.2 U6.7
CAN_L: C54.1 D13.1 J22.4(B2) R68.2 R69.1
CAN_L_R: R69.2 U6.6
DBGIF_DETECT: R42.1 U3.E9
DBGIF_ISP0_CTRL: R35.2 U3.C13
DBGIF_RESET: R34.2 U3.E6
DBGIF_TCK_SWCLK: JP8.1 U3.L12
DBGIF_TDI: R37.2 U3.F5
DBGIF_TDO_SWO: R36.2 U3.F8
DBGIF_TMS_SWDIO: R33.2 U3.B11
DBGIF_VREF: C33.1 R23.2 R24.1 U3.L1
FL_USB1_DM: J21.A7 J21.B7 U3.N6 U4.1
FL_USB1_DP: J21.A6 J21.B6 U3.M6 U4.2
HW_VER_0: R27.1 U3.E8
HW_VER_1: R28.1 U3.A8
HW_VER_2: R29.1 U3.F9
HW_VER_3: R30.1 U3.B2
HW_VER_4: R31.1 U3.M5
HW_VER_5: R32.1 U3.H5
HW_VER_6: JP6.2 U3.H9
HW_VER_7: JP7.2 U3.N2
HW_VER_8: R26.1 U3.L13
JTAG_VREF: J24.1 R38.2
LDO_3V3: C3.1 C4.1 J3.8 J17.1 J18.1 JP1.2 JP3.1 R4.1 R6.1 R11.1 TP2.1(PIN1) TP12.1(PIN1) U2.5
LED_USB_COMM: D5.C(CATHODE) U3.F12
LED_VCOM_ACT: D7.C(CATHODE) U3.B6
MCU_LINK_3V3: C14.1 C15.1 C16.1 C17.1 C18.1 C30.1 C31.1 L2.2 R12.1 U3.A3 U3.A5 U3.A9 U3.A13 U3.M1 U3.N7
MCU_LINK_N_16MHZ: C28.1 U3.M3 Y1.3
MCU_LINK_P_16MHZ: C29.1 U3.N3 Y1.1
MCU_LINK_RST: R13.2 U3.J6
MCU_LNK_RX: R46.1 U3.E12
MCU_LNK_TX: R45.1 U3.A11
MCU_VDD_P3V3: JP2.1 JP3.2 JP4.1 R5.1 R6.2 R7.1 R9.1
P0_0/SWDIO: D10.6(K5) J24.2 R33.1 R39.2 U8.76
P0_1/SWCLK: D10.5 J24.4 JP8.2 R43.1 U8.77
P0_2: D10.4 J24.6 R36.1 R45.2 U8.78
P0_3: D10.3 J24.8 R37.1 R40.2 R46.2 U8.79
P0_6: D9.C J10.1 J24.7 R35.1 R84.1 U8.80
P0_6/ISPMODE_N-SW: C38.1 R48.2 R84.2 SW3.3 SW3.4
P0_16: J8.13 J11.1 R54.2 R55.2 R77.1 R87.1 U8.83
P0_16/LPI2C0_SDA-ARD_D18: J2.18 R87.2
P0_17: J8.14 J12.1 R57.2 R78.1 R88.1 U8.84
P0_17/LPI2C0_SCL-ARD_D19: J2.20 R88.2
P0_18/FXIO_D2: J8.15 U8.85
P0_19/FXIO_D3: J8.16 U8.86
P0_20/FXIO_D4: J8.17 U8.87
P0_21/FXIO_D5: J8.18(B9) U8.88
P0_22/FXIO_D6: J8.19 U8.89
P0_23/FXIO_D7: J8.20 U8.90
P1_0: J6.6 J7.3 U8.91
P1_1: J6.4 J7.7 U8.92
P1_2: J6.5 J7.5 U8.93
P1_3: J6.3 J7.1 U8.94
P1_4/ADC0_A20-MC_BEMF_A: J2.1 U8.97
P1_5/ADC0_A21-MC_BEMF_B: J2.3 U8.98
P1_6/TRIG_IN2-MC_ENC_I: J1.3 U8.99
P1_7/WUU0_IN9-SW: C40.1 R50.2 SW2.3 SW2.4 U8.100
P1_8: J8.4 J9.3 R80.2 U8.1
P1_9: J8.3 J9.4 R79.2 U8.2
P1_10: J2.19 J4.2 U8.3
P1_11/I3C0_PUR-P3T: R54.1 TP3.1(PIN1) U8.4
P1_12: J4.10 R75.1 U8.5
P1_12/CAN_RXD: R75.2 U6.4
P1_13: J4.12(B6) R76.1 U8.6
P1_13/CAN_TXD: R76.2 U6.1
P1_14: J1.16(B8) J9.17 U8.7
P1_15: J2.2 J9.18 U8.8
P1_29/MCU_RESET_B: C36.1 C37.1 D10.1 D11.C(CATHODE) J3.6 J24.10(B5) R34.1 R41.2 R47.2 SW1.3 SW1.4 U8.9
P1_30/XTAL48M: C35.2 U8.10 Y2.1
P1_31/EXTAL48M: C39.1 U8.11 Y2.3
P2_0/FXIO_D8: J8.21 J9.15 U8.22
P2_1: J2.7 J8.22 J9.16 U8.23
P2_2/ADC0_A4-MC_CURRENT_DCB: J2.9 U8.24
P2_3: J2.17 J4.6 U8.25
P2_4: J2.11 J4.8 U8.26
P2_5: J2.13 J4.4 U8.27
P2_6: J2.15 R59.3 U8.28
P2_7/TRIG_IN5-MC_ENC_B: J3.1 U8.29
P2_10/LPUART2_TXD-ARD_D1_TX: J1.4 U8.30
P2_11/LPUART2_RXD-ARD_D0_RX: J1.2 U8.31
P2_12: J2.12 R8.2 R10.1 U8.34
P2_13/LPSPI1_SDO-ARD_D11: R60.3 U8.35
P2_15/FXIO_LCD_INT: J8.5 U8.36
P2_16: J2.5 J2.10 U8.37
P2_17: J4.3 J8.8 U8.38
P2_19/FXIO_LCD_CS: J8.9 U8.39
P2_20: J3.3 J8.11 U8.40
P2_21/FXIO_LCD_TE: J8.12 U8.41
P2_23/FXIO_LCD_WR: J8.10 U8.42
P3_0: J8.7 R72.1 U8.73
P3_0/PWM0_A0-BLED: R58.2 R72.2
P3_1: J1.6 J9.6 U8.72
P3_6: J9.7 R83.1 U8.71
P3_6/PWM0_A0-MC_PWM_AT: J3.15 R83.2
P3_7/PWM0_B0-MC_PWM_AB: J3.13 U8.70
P3_8/PWM0_A1-MC_PWM_BT: J3.11 U8.69
P3_9/PWM0_B1-MC_PWM_BB: J3.9 U8.68
P3_10/PWM0_A2-MC_PWM_CT: J3.7 U8.67
P3_11/PWM0_B2-MC_PWM_CB: J3.5 U8.66
P3_12: J1.8 J1.15 R73.1 U8.63
P3_12/PWM1_A2-RLED: R52.2 R73.2
P3_13: J1.13 R59.1 R74.1 U8.62
P3_13/PWM1_B2-GLED: R56.2 R74.2
P3_14: J1.11 J1.12 U8.61
P3_15: J1.9 R60.1 U8.60
P3_16: J1.7 J1.14 U8.59
P3_17: J1.5 J2.4 U8.58
P3_18: J5.1 J9.5 U8.57
P3_19: J5.2 J7.2 U8.56
P3_20: J5.3 J7.4 U8.55
P3_21: J5.4 J9.8 U8.54
P3_22/FXIO_LCD_GPIO: J8.6 U8.53
P3_27: J5.5 J7.6 R85.2 U8.52
P3_28: J5.6 J7.8 R86.2 U8.51
P3_29/GPIO-MIKROE: J6.2 U8.50
P3_30/ADC1_A21-MIKROE_AN: J6.1 U8.49
P3_31: J1.10 J4.5 U8.48
P4_2/FXIO_D10: J8.23 J9.13 U8.16
P4_3/FXIO_D11: J8.24 J9.14 U8.17
P4_4/FXIO_D12: J8.25 J9.11 U8.18
P4_5/FXIO_D13: J8.26 J9.12 U8.19
P4_6: J4.1 J8.27 J9.9 U8.20
P4_7/FXIO_D15: J8.28 J9.10 U8.21
P5-9V_VIN: C43.1 C44.1 C45.1 J3.16(B8) J14.1
PIO0_5-ISP_EN-LED_SWD_ACT: D6.C(CATHODE) JP5.2 R25.2 U3.A7
SYS_5V0: C1.1 C2.1 C48.1 C49.1 C50.1 D1.C D2.C D3.C J3.10 J5.7 J22.1 TP1.1(PIN1) TP11.1(PIN1) U2.1 U2.4 U6.3
USB0_DM: J23.A7 J23.B7 U7.1 U8.44
USB0_DP: J23.A6 J23.B6 U7.2 U8.45
VREF_MCULINK: C20.1 C21.1 L3.2 TP6.1(PIN1) U3.G1 U3.G2
N84836: C19.1 R12.2 R13.1
N85250: D5.A R14.2
N85474: D6.A R15.2
N85648: C22.1 C23.1 C24.1 L5.2 U3.M9 U3.N9
N85680: D7.A R16.2
N85830: L5.1 U3.N11
N87448: R17.2 R20.1 U3.N8
N112823: D4.A R11.2
N301213: D8.C J24.9 R42.2 R44.1
N383974: D12.3 R56.1
N384008: D12.4(CATHODE3) R58.1
N384038: D12.2 R52.1
N479793: D12.1 R53.2
N629677: D11.A R49.2
N1221514: TP4.1(PIN1) U5.3
N1409174: J2.6 R59.2
N1409188: J2.8 R60.2
N1590729: C32.1 J21.A4 J21.A9 J21.B4(VBUS4) J21.B9 L6.1 U4.6(VBUS)
N1590769: J21.A5 R18.1
N1590873: J21.B5 R19.1
N16737461: R63.2 R67.1 U6.8
N16737733: C53.1 R66.2 R68.1
N16764659: C56.1 J23.A4 J23.A9 J23.B4(VBUS4) J23.B9 L8.1 U7.6(VBUS)
N16764707: J23.A5 R70.1
N16764881: J23.B5 R71.1
N16766719: JP4.2 L1.2 R7.2
N16904732: R77.2 U5.1
N16904810: R78.2 U5.2

Pads without a net: J1 1; J3 2; J4 7 9 11; J21 A8 B8; J23 A8 B8; U2 3; U3 A1 A2 A6 A12 B3 B7 B8 B12 C1 C2 C7 C12 E1 E2 E5 E7 E13 F1 F2 F6 F13 G3 G5 G6 G8 G9 G11 G12 G13 H6 H8 H12 H13 J1 J2 J5 J7 J8 J9 J12 L2 L7 M2 M7 M8; U4 3 4 5; U7 3 4 5

## Via types
v1: diameter 0.508, hole 0.254, TOP to BOTTOM, 502 vias
v2: diameter 0.457, hole 0.203, TOP to BOTTOM, 31 vias
v3: diameter 0.508, hole 0.257, TOP to BOTTOM, 7 vias

## Routing (per net, layer and track width the routed paths; a pad name or vN(x,y) marks a point on that pad's centre or on a via; arc(x,y) is an arc through that point)
GND: length 396.1
  TOP w0.127: v1(18.84,23.44) 18.22,22.81 13.64,22.81 13.46,22.99
  TOP w0.254: U3.B1 v1(28.33,36.39) ; v2(27.81,32.17) 27.81,31.96 28.07,31.71 U3.B9 ; U3.B5 27.79,33.71 v2(27.63,33.87) ; v2(23.92,30.93) 23.55,30.93 U3.M11 U3.M12 U3.N12 22.69,30.21 22.25,29.76 v2(22.25,29.53) ; U3.B13 v2(28.33,29.19) ; U3.H1 v2(25.33,36.38) ; U3.N5 22.81,33.72 v2(21.64,33.72) ; U3.N1 22.02,36.52 v2(22.02,36.64) ; U3.H2 25.33,34.75 v2(25.19,34.61) ; v2(25.07,29.15) 24.83,29.39 U3.J13
  TOP w0.305: C33.2 v1(20.11,39.18) ; C33.2 20.42,38.73 ; C33.2 20.29,38.92 ; SW1.2 12.1,53.79 ; SW1.2 v1(11.11,53.21) ; SW1.2 12.1,52.62 ; SW1.2 12.88,53.21 ; C21.2 28.31,41.41 ; C21.2 27.61,39.76 ; C21.2 v1(28.5,40.58) ; R70.2 9.83,24.83 v1(10.08,24.58) ; R70.2 9.37,25.01 ; R70.2 10.4,25.47 ; 85.99,52.55 SW2.1 ; SW2.1 86.58,53.32 ; SW2.1 85.41,53.32 ; SW2.1 85.99,54.1 ; C32.2 10.28,35.45 ; C32.2 v1(10.72,34.99) ; C32.2 9.83,35.56 ; C26.2 v1(22.02,24.45) ; U8.74 50.14,22.13 C8.2 v1(49.91,23.11) ; 1.08,45.59 C36.2 ; C36.2 v1(1.65,44.7) ; C36.2 1.2,46.05 ; 78.92,44.63 C41.2 79.38,44.51 ; C37.2 v1(4.95,44.7) ; C37.2 4.69,45 ; C37.2 5.21,45 ; U8.46 55.36,36.64 C61.2 55.24,37.29 v1(55.24,37.67) ; R28.2 C16.2 v1(32.81,31.44) ; U8.12 68.76,27.13 C10.2 69.47,26.42 v1(69.6,26.42) ; R10.2 61.47,42.04 61.85,41.66 v1(61.85,41.53) ; 85.41,5.83 SW3.1 ; SW3.1 86.58,5.83 ; SW3.1 85.99,6.6 ; SW3.1 85.99,5.05 ; R26.2 v1(23.29,24.45) ; R26.2 22.72,25.21 ; R26.2 23.86,25.21 ; 79.33,52.9 C40.2 ; C40.2 79.33,54.04 ; C40.2 78.76,53.47 ; 77.79,45.09 C42.2 78.36,44.51 ; 19.61,37.25 C29.2 ; C29.2 19.61,37.48 ; C29.2 19.36,37.02 v1(19.23,37.15) 19.06,36.98 Y1.4 18.12,38.26 v1(18.08,38.29) 15.67,38.29 15.29,37.91 v1(15.29,37.53) v1(15.29,34.78) ; R18.2 10.4,40.71 ; R18.2 9.83,40.2 v1(10.08,39.95) ; R18.2 10.28,40.25 ; 9.83,35.69 R19.2 10.4,36.26 ; SW3.2 85.99,2.45 ; SW3.2 85.41,1.68 ; SW3.2 85.99,0.9 ; SW3.2 86.58,1.68 ; C56.2 10.28,19.57 ; C56.2 9.83,19.69 ; C56.2 v1(10.59,19.12) ; C2.2 34.85,12.58 ; C2.2 35.42,12.01 ; C2.2 34.28,12.01 ; C39.2 70.05,27.89 v1(69.57,28.37) 69.57,28.68 C9.2 70.36,29.46 v1(73.41,29.46) 73.92,28.95 Y2.2 74.75,28.19 75.06,27.88 v1(75.06,26.04) 75.06,23.52 74.65,23.11 v1(71.62,23.11) Y2.4 70.24,24.39 C35.1 69.9,24.46 v1(69.41,24.96) ; U8.96 63.36,18.62 C7.2 63.63,18.03 v1(64.01,17.65) ; C17.2 v1(32.81,28.77) ; U6.2 27.65,11.93 v1(28.02,11.56) 28.14,11.68 C49.2 v1(29.59,11.68) C50.2 v1(31.24,11.68) ; U8.32 62.36,36.65 C59.2 v1(62.61,37.67) ; 26.85,38.61 C20.2 ; C20.2 27.3,39.64 ; C20.2 v1(27.86,39.18) ; 20.37,38.55 C15.2 21.28,37.65 ; C30.2 R30.2 v1(32.81,36.64) ; SW2.2 86.58,49.17 ; SW2.2 85.99,49.95 ; SW2.2 85.99,48.4 ; SW2.2 85.41,49.17 ; R44.2 v1(9.46,7.05) ; 9.83,19.82 R71.2 ; R71.2 9.83,20.96 ; R71.2 v1(10.59,20.39) ; 13.14,14.61 C53.2 ; C53.2 13.72,15.18 ; C53.2 13.72,14.03 ; v1(15.29,34.78) Y1.2 ; v1(15.29,34.78) 15.29,33.77 15.59,33.47 v1(16.43,33.47) 17.32,33.47 R20.2 18.23,33.21 18.36,33.34 v1(18.72,33.34) 18.72,32.97 19.18,32.51 C31.2 R31.2 20.11,33.96 C28.2 19.36,34.36 v1(19.35,34.36) ; D8.A v1(10.15,5.91) ; v1(20.4,15.05) 20.02,14.66 C54.2 ; C22.2 18.21,31.56 v1(18.08,31.56) ; 7.95,52.62 SW1.1 ; SW1.1 7.95,53.79 ; SW1.1 v1(8.95,53.21) ; SW1.1 7.18,53.21 ; v1(16.43,31.44) 16.81,31.44 C24.2 ; R29.2 v1(32.81,27.5) ; 43.17,12.01 C3.2 43.74,12.58 ; C18.2 v1(32.81,33.98) ; v1(56.64,17.53) C60.2 56.36,18.64 U8.82 ; C19.2 22.91,42.74 v1(22.53,43.12) ; C27.2 v1(20.75,23.44) ; D9.A v1(10.15,4.64) ; R24.2 v1(19.35,40.45) ; v1(49.15,27.43) C6.2 50.22,27.13 U8.64 ; C12.2 v1(57.91,37.67) ; C25.2 v1(18.84,23.44) ; R43.2 v1(13.21,10.92) ; R32.2 v1(24.56,40.96) ; 20.72,9.08 R67.2 21.29,8.5 ; C38.2 v1(86.23,9.4) ; D10.2 v1(6.65,10.86) ; R27.2 v1(32.81,30.17)
  TOP w0.381: C52.1 19.76,10.6 v1(19.13,9.97) ; v1(46.66,37.28) 46.66,37.41 46.78,37.53 C11.2 ; R67.2 21.16,8.95 v1(20.53,8.95) ; C51.2 21.29,14.66 v1(21.67,15.05) ; C13.2 v1(28.96,42.16) ; R19.2 9.83,37.15 10.01,37.15 v1(10.08,37.08) ; D13.3 v1(16.76,6.73) ; C5.2 43.75,28.52 v1(43.62,28.64) ; D4.C 38.16,20.89
  TOP w0.508: 3.67,18.87 J23.SH2 ; J23.SH2 5.12,18.17 ; J23.SH2 6.57,18.87 ; 1.74,33.27 J21.SH4 ; J21.SH4 2.84,33.97 ; J21.SH4 1.74,34.67 ; 1.74,26.82 J23.SH3 ; J23.SH3 1.74,28.22 ; J23.SH3 2.84,27.52 ; 3.67,33.97 J21.SH2 ; J21.SH2 5.12,33.27 ; J21.SH2 6.57,33.97 ; J16.1 81.99,10.54 ; J16.1 80.9,9.45 ; J16.1 80.9,11.63 ; J19.1 73.31,51.82 ; J19.1 72.22,52.91 ; J19.1 71.12,51.82 ; J21.SH1 6.57,42.62 ; J21.SH1 5.12,43.32 ; J21.SH1 3.67,42.62 ; JP7.1 14.4,42.09 ; JP7.1 14.4,39.83 ; JP7.1 13.27,40.96 ; JP7.1 15.53,40.96 ; J23.SH1 5.12,28.22 ; J23.SH1 6.57,27.52 ; J23.SH1 3.67,27.52 ; J21.SH3 1.74,43.32 ; J21.SH3 1.74,41.92 ; J21.SH3 2.84,42.62 ; J15.1 12.71,2.73 ; J15.1 11.62,3.82 ; J15.1 10.53,2.73 ; J15.1 11.62,1.64 ; v1(69.09,43.43) C48.2 v1(70.23,42.04) ; J6.8 69.09,15.77 C47.2 v1(70.23,13.21) ; J23.SH4 1.74,19.57 ; J23.SH4 1.74,18.17 ; J23.SH4 2.84,18.87 ; J22.3 18.03,3.89 ; J22.3 19.13,2.79 ; J22.3 16.94,2.79 ; J22.3 18.03,1.7
  TOP w0.762: J5.8 69.09,39.49 C48.2
  L2_GND w0.381: J24.3 0.94,12.89 ; 1.21,11.62 J24.5
  L2_GND w0.508: 68.39,2.92 J7.10 ; J7.10 69.47,4 ; J7.10 69.47,1.84 ; J7.10 70.55,2.92 ; J8.2 89.33,45.04 ; J8.2 88.3,44.01 ; J8.2 90.36,44.01 ; J8.2 89.33,42.98 ; 4.17,41.27 J21.B12 5.33,41.27 ; 80.9,9.45 J16.1 ; J16.1 79.81,10.54 ; J16.1 81.99,10.54 ; J16.1 80.9,11.63 ; J5.8 69.52,40.16 ; J5.8 70.62,39.06 ; J5.8 69.52,37.95 ; J5.8 68.41,39.06 ; J3.14 42.48,3.37 ; J3.14 40.32,3.37 ; J3.14 41.4,4.45 ; J3.14 41.4,2.29 ; 69.47,4.38 J7.9 ; J7.9 68.39,5.46 ; J7.9 70.55,5.46 ; J7.9 69.47,6.54 ; J2.14 24.64,52.71 ; J2.14 24.64,50.55 ; J2.14 25.72,51.63 ; J2.14 23.56,51.63 ; 5.33,20.22 J23.B1 4.17,20.22 ; 6.68,35.32 J21.A12 5.52,35.32 ; 31.64,24.45 JP5.1 ; JP5.1 32.77,25.58 ; JP5.1 33.9,24.45 ; JP5.1 32.77,23.32 ; 5.52,20.22 J23.A12 6.68,20.22 ; JP7.1 15.53,40.96 ; JP7.1 14.4,39.83 ; JP7.1 13.27,40.96 ; JP7.1 14.4,42.09 ; 4.17,26.17 J23.B12 5.33,26.17 ; 32.81,43.74 J20.1 ; J20.1 33.91,44.83 ; J20.1 31.72,44.83 ; J20.1 32.81,45.92 ; J6.8 70.62,16.2 ; J6.8 69.52,17.3 ; J6.8 68.41,16.2 ; J6.8 69.52,15.09 ; J19.1 72.22,52.91 ; J19.1 71.12,51.82 ; J19.1 73.31,51.82 ; J19.1 72.22,50.72 ; 6.68,41.27 J21.A1 5.52,41.27 ; 18.03,1.7 J22.3 ; J22.3 16.94,2.79 ; J22.3 18.03,3.89 ; J22.3 19.13,2.79 ; J9.1 78.47,17.33 ; J9.1 77.39,18.41 ; J9.1 77.39,16.25 ; J9.1 76.31,17.33 ; J3.12 39.94,3.37 ; J3.12 38.86,2.29 ; J3.12 38.86,4.45 ; J3.12 37.78,3.37 ; 4.17,35.32 J21.B1 5.33,35.32 ; 13.27,44.83 JP6.1 ; JP6.1 14.4,43.7 ; JP6.1 15.53,44.83 ; JP6.1 14.4,45.96 ; 10.53,2.73 J15.1 ; J15.1 11.62,1.64 ; J15.1 12.71,2.73 ; J15.1 11.62,3.82 ; 6.68,26.17 J23.A1 5.52,26.17
  L3_PWR w0.508: 6.68,41.27 J21.A1 5.52,41.27 ; J23.SH2 5.12,19.57 ; J23.SH2 3.67,18.87 ; J23.SH2 5.12,18.17 ; J23.SH2 6.57,18.87 ; J21.SH1 6.57,42.62 ; J21.SH1 5.12,43.32 ; J21.SH1 3.67,42.62 ; J21.SH1 5.12,41.92 ; J21.SH3 1.74,43.32 ; J21.SH3 2.84,42.62 ; J21.SH3 1.74,41.92 ; 4.17,41.27 J21.B12 5.33,41.27 ; 13.27,44.83 JP6.1 ; JP6.1 14.4,45.96 ; JP6.1 14.4,43.7 ; J23.SH4 2.84,18.87 ; J23.SH4 1.74,18.17 ; J23.SH4 1.74,19.57 ; 4.17,35.32 J21.B1 5.33,35.32 ; J21.SH4 2.84,33.97 ; J21.SH4 1.74,33.27 ; J21.SH4 1.74,34.67 ; 13.27,40.96 JP7.1 ; JP7.1 15.53,40.96 ; JP7.1 14.4,39.83 ; JP7.1 14.4,42.09 ; 5.12,33.27 J21.SH2 ; J21.SH2 3.67,33.97 ; J21.SH2 6.57,33.97 ; J21.SH2 5.12,34.67 ; 5.12,26.82 J23.SH1 ; J23.SH1 3.67,27.52 ; J23.SH1 6.57,27.52 ; J23.SH1 5.12,28.22 ; 5.52,20.22 J23.A12 6.68,20.22 ; 6.68,35.32 J21.A12 5.52,35.32 ; 5.33,20.22 J23.B1 4.17,20.22 ; 1.74,26.82 J23.SH3 ; J23.SH3 1.74,28.22 ; J23.SH3 2.84,27.52 ; 6.68,26.17 J23.A1 5.52,26.17 ; 4.17,26.17 J23.B12 5.33,26.17
  BOTTOM w0.508: J21.SH3 1.74,43.32 ; J21.SH3 2.84,42.62 ; J21.SH3 1.74,41.92 ; 72.22,52.91 J19.1 71.12,51.82 ; J23.SH2 6.57,18.87 ; J23.SH2 3.67,18.87 ; J23.SH2 5.12,18.17 ; J21.SH1 5.12,43.32 ; J21.SH1 6.57,42.62 ; J21.SH1 3.67,42.62 ; 68.39,2.92 J7.10 ; J7.10 69.47,1.84 ; J7.10 69.47,4 ; J7.10 70.55,2.92 ; J23.SH3 2.84,27.52 ; J23.SH3 1.74,26.82 ; J23.SH3 1.74,28.22 ; 31.64,24.45 JP5.1 ; JP5.1 32.77,25.58 ; JP5.1 32.77,23.32 ; 3.67,27.52 J23.SH1 ; J23.SH1 6.57,27.52 ; J23.SH1 5.12,28.22 ; J8.2 89.33,45.04 ; J8.2 88.3,44.01 ; J8.2 89.33,42.98 ; J8.2 90.36,44.01 ; JP6.1 14.4,45.96 ; JP6.1 14.4,43.7 ; JP6.1 13.27,44.83 ; JP6.1 15.53,44.83 ; 5.12,33.27 J21.SH2 3.67,33.97 ; 81.99,10.54 J16.1 80.9,9.45 ; 1.74,33.27 J21.SH4 ; J21.SH4 2.84,33.97 ; J21.SH4 1.74,34.67 ; J23.SH4 2.84,18.87 ; J23.SH4 1.74,19.57 ; J23.SH4 1.74,18.17 ; J7.9 70.55,5.46 ; J7.9 69.47,4.38 ; J7.9 68.39,5.46
  vias: v1(0.76,47.43) v1(0.76,44.64) v1(0.76,41.08) v1(0.76,38.54) v1(0.76,36) v1(0.76,31.94) v1(0.76,29.4) v1(0.76,25.59) v1(0.76,21.78) v1(0.76,16.95) v1(0.76,14.41) v1(0.76,11.87) v1(0.76,10.6) v1(0.76,8.06) v1(4.57,31.94) v1(4.57,29.4) v1(4.57,16.95) v1(5.45,0.76) v1(6.06,54.24) v1(6.22,48.01) v1(8,42.8) v1(8,31.88) v1(8,27.69) v1(8,16) v1(8.38,29.4) v1(10.08,22.04) v1(11.86,43.37) v1(11.86,42.1) v1(11.86,32.45) v1(11.86,31.18) v1(11.86,28.26) v1(11.86,26.99) v1(11.94,15.62) v1(12.37,14.55) v1(12.37,13.4) v1(13.07,0.76) v1(13.68,54.24) v1(13.64,15.56) v1(14.1,51.18) v1(14.1,48.26) v1(14.34,0.76) v1(15.61,0.76) v1(16.22,54.24) v1(18.15,0.76) v1(18.76,54.24) v1(20.07,2.29) v1(20.69,0.76) v1(20.73,31.19) v1(21.3,54.24) v1(21.26,20.9) v1(21.26,19.63) v1(23.23,0.76) v1(23.8,20.9) v1(23.8,19.63) v1(23.84,54.24) v1(25.77,0.76) v1(26.38,54.24) v1(26.34,19.63) v1(26.8,14.86) v1(28.31,0.76) v1(28.88,19.63) v1(28.92,54.24) v1(30.85,0.76) v1(31.46,54.24) v1(31.42,19.63) v1(31.54,37.79) v1(32.81,37.79) v1(33.39,0.76) v1(33.58,14.42) v1(33.58,13.15) v1(34,54.24) v1(33.96,19.63) v1(34.85,14.42) v1(34.85,13.15) v1(35.23,19.63) v1(35.93,0.76) v1(36.5,19.63) v1(36.54,54.24) v1(37.13,12.13) v1(37.77,19.63) v1(37.89,9.72) v1(38.47,0.76) v1(39.08,54.24) v1(39.42,9.72) v1(40.18,12.13) v1(41.01,0.76) v1(41.62,54.24) v1(42.09,14.42) v1(42.09,13.15) v1(43.36,14.42) v1(43.36,13.15) v1(43.55,0.76) v1(44.16,54.24) v1(46.09,0.76) v1(46.7,54.24) v1(48.63,0.76) v1(49.24,54.24) v1(51.17,0.76) v1(51.78,54.24) v1(53.71,0.76) v1(54.32,54.24) v1(56.25,0.76) v1(56.86,54.24) v1(58.79,0.76) v1(59.4,54.24) v1(61.33,0.76) v1(61.94,54.24) v1(63.87,0.76) v1(64.48,54.24) v1(65.91,51.82) v1(66.41,0.76) v1(67.02,54.24) v1(68.95,0.76) v1(69.22,51.94) v1(69.56,54.24) v1(71.49,0.76) v1(72.1,54.24) v1(72.26,43.31) v1(74.03,0.76) v1(74.64,54.24) v1(75.44,44.7) v1(76.58,43.18) v1(76.57,0.76) v1(77.18,54.24) v1(77.98,44.07) v1(79.11,0.76) v1(79.25,44.07) v1(79.63,50.04) v1(79.72,54.24) v1(80.9,8.51) v1(81.41,50.93) v1(81.65,0.76) v1(82.04,4.45) v1(82.26,54.24) v1(82.42,49.15) v1(83.69,12.07) v1(84.8,54.24) v1(84.83,0.76) v1(85.98,3.43) v1(86.11,51.05) v1(86.73,0.76) v1(86.87,44.58) v1(87.12,6.35) v1(87.25,49.15) v1(87.34,54.24) v1(89.92,46.61) v1(90.81,8.51) v1(94.24,47.38) v1(94.24,44.84) v1(94.24,42.3) v1(94.24,39.76) v1(94.24,37.22) v1(94.24,34.68) v1(94.24,32.14) v1(94.24,29.6) v1(94.24,27.06) v1(94.24,24.52) v1(94.24,21.98) v1(94.24,19.44) v1(94.24,16.9) v1(94.24,14.36) v1(94.24,11.82) v1(94.24,9.28) v1(94.24,8.01) v2(8.48,39.82) v2(8.48,37.53) v2(8.48,24.71) v2(8.48,22.42) v2(11.36,21.31) v2(13.65,21.18) v2(23.75,34.16) v3(25.1,13.01) v3(25.1,11.49) v3(26.11,13.01) v3(26.11,11.49) v3(38.66,13.4) v3(38.66,12.13) v3(38.66,10.86)
P5V_MCU_LINK_USB: length 4
  TOP w0.508: D2.A 13.78,33.7 R17.1
  BOTTOM w0.508: v1(11.86,33.72) 11.86,33.72 TP8.1
P5V_USB_FS: length 71.5
  TOP w0.508: v1(24.51,15.75) 24.1,16.15 19.41,16.15 18.92,16.64 14.73,16.64 13.39,17.97 C55.1 ; v1(40.13,42.29) 40.13,39.75 39.37,38.99 v1(39.37,23.88) ; v1(48.64,43.18) 49.66,44.2 55.5,44.2 R8.1
  BOTTOM w0.508: v1(24.51,15.75) 31.62,15.75 TP10.1 34.42,18.54 38.1,18.54 39.37,19.81 v1(39.37,23.88) ; v1(48.64,43.18) 47.75,42.29 v1(40.13,42.29)
VBAT_DCDC/VBAT_PMU: length 1.3
  BOTTOM w0.508: v1(22.02,26.99) 22.03,26.98 TP7.1
VDD_BOARD: length 63.2
  TOP w0.305: R48.1 v1(86.23,10.67) ; v1(20.53,9.97) 20.91,10.35 R63.1 ; R80.1 v1(71.63,19.18) ; R47.1 v1(7.11,46.48) ; R16.1 v1(25.15,44.2) ; R50.1 v1(79.33,51.05) ; 23.49,13.23 U6.5 ; R40.1 v1(13.21,8.38) ; R79.1 v1(71.63,20.45) ; R14.1 v1(22.61,44.2) ; R41.1 v1(13.21,9.65) ; R49.1 v1(20.07,44.2) ; R25.1 v1(38.61,25.47) ; R39.1 v1(13.21,12.19) ; R23.1 v1(19.35,42.36) ; R15.1 v1(27.69,44.2)
  TOP w0.381: 48.7,36.77 48.7,35.5 v1(47.94,35.5) ; 23.49,13.23 23.23,13.23 C51.1 22.3,14.28 22.81,14.79 v1(22.81,15.05)
  TOP w0.508: v1(27.69,44.2) v1(27.69,43.18) 27.82,43.05 L3.1 ; R38.1 C34.1 v1(9.83,12.89) ; J6.7 67.56,15.61 C47.1 v1(66.55,13.21)
  L3_PWR w0.508: J8.1 92.9,44.01 ; J8.1 90.84,44.01 ; J8.1 91.87,42.98 ; J8.1 91.87,45.04 ; J6.7 66.98,17.3 ; J6.7 68.08,16.2 ; J6.7 66.98,15.09 ; J6.7 65.87,16.2 ; 65.85,5.46 J7.11 ; J7.11 68.01,5.46 ; J7.11 66.93,6.54 ; J7.11 66.93,4.38 ; J7.12 68.01,2.92 ; J7.12 66.93,1.84 ; J7.12 66.93,4 ; J7.12 65.85,2.92 ; 79.93,16.25 J9.2 ; J9.2 79.93,18.41 ; J9.2 78.85,17.33 ; J9.2 81.01,17.33
  BOTTOM w0.508: v1(7.11,46.48) 11.81,46.48 12.32,46.99 15.81,46.99 16.45,46.35 17.91,46.35 v1(20.07,44.2)
  vias: v1(14.78,24.71) v1(14.78,23.44) v1(16.05,24.71) v1(16.05,23.44) v1(32.89,42.8) v1(32.89,41.27) v1(80.64,42.67) v1(81.92,42.67)
VDD_MCU: length 100.8
  TOP w0.305: C61.1 54.86,36.66 U8.47 54.86,34.42 55.31,33.97 ; C9.1 68.5,28.63 U8.15 66.12,28.63 65.66,29.08 ; C5.1 44.37,30.1 ; C5.1 44.94,29.53 ; C5.1 43.8,29.53 ; C7.1 62.86,18.6 U8.95 ; v1(49.15,26.16) 49.4,26.42 C6.1 50.12,26.63 U8.65 ; U8.75 50.2,21.63 C8.1 49.59,21.34 v1(49.09,21.84) ; U8.81 55.86,18.58 C60.1 ; v1(61.34,37.67) 61.34,37.16 C59.1 61.86,36.64 61.86,35.38 U8.33 61.86,34.04
  TOP w0.381: v1(61.72,14.22) 61.98,14.22 63.14,15.39 63.14,16.99 62.61,17.53 C7.1 ; C60.1 55.55,18.28 v1(55.55,14.86)
  TOP w0.508: v1(65.34,30.67) 65.66,30.35 65.66,29.08 ; 61.86,34.04 61.86,33.41 58.74,30.29 v1(58.74,28.07) ; v1(53.34,14.1) 53.72,14.48 55.17,14.48 v1(55.55,14.86) ; v1(57.34,28.07) 57.34,31.18 56.39,32.13 56.39,32.89 55.31,33.97
  BOTTOM w0.508: v1(65.34,30.67) 64.38,30.67 62.93,32.12 62.93,36.08 v1(61.34,37.67) ; v1(55.55,14.86) 56.18,14.22 v1(61.72,14.22)
  BOTTOM w0.762: v1(58.74,28.07) v1(57.34,28.07) 56.45,28.07 55.24,26.86 53.15,26.86 52.45,26.16 v1(49.15,26.16) ; v1(49.15,26.16) 48.58,25.59 48.58,22.35 v1(49.09,21.84) 51.44,21.84 52.7,20.57 52.7,19.18 51.44,17.91 50.42,17.91 49.66,17.14 49.66,15.11 50.67,14.1 v1(53.34,14.1) ; v1(49.15,26.16) 49.02,26.16 48.07,27.11 48.07,27.75 46.44,29.38 v1(45.51,29.38) v1(45.51,30.42)
VDD_P3T: length 18.6
  TOP w0.305: 78.36,46.67 C42.1 77.79,46.1 ; v1(68.2,46.35) 67.69,46.35 R57.1 ; 79.38,46.67 C41.1 79.95,46.1 ; v1(65.66,48.39) R55.1
  BOTTOM w0.508: v1(65.66,48.39) 66.8,48.39 68.2,46.99 v1(68.2,46.35) 68.96,45.59 70.36,45.59 TP9.1 72.14,47.37 v1(76.33,47.37)
VDD_USB: length 21.7
  TOP w0.305: U8.43 56.86,36.87 C12.1 v1(56.9,37.67)
  TOP w0.508: v1(56.01,40.89) 54.86,42.04 43.54,42.04 R9.2
  BOTTOM w0.381: v1(56.9,37.67) 56.31,37.67 55.55,38.43 55.55,40.43 v1(56.01,40.89)
  BOTTOM w0.508: TP5.1 57.44,37.12 v1(56.9,37.67)
VDDA_MCU: length 73.3
  TOP w0.305: 45.39,40.26 L1.1 45.84,40.15 ; U8.13 68.65,27.63 C10.1 68.77,28.13 U8.14
  TOP w0.381: 23.37,48.07 23.37,50.36 J2.16
  TOP w0.508: v1(64.64,29.91) 64.64,28.45 65.15,27.94 65.79,27.94 ; v1(30.99,43.31) 30.1,44.2 30.1,47.11 29.64,47.56 23.88,47.56 23.37,48.07 ; L1.1 46.66,39.69 C11.1
  BOTTOM w0.508: v1(30.99,43.31) 32.26,42.04 34.04,42.04 34.87,41.2 39.19,41.2 39.63,40.76 v1(46.48,40.76) 46.48,38.86 45.97,38.35 45.97,35.18 46.93,34.23 46.93,32.96 48.58,31.31 50.86,31.31 54.8,35.24 61.02,35.24 62.17,34.1 62.17,31.92 64.17,29.91 v1(64.64,29.91)
CAN_H: length 15.8
  TOP w0.381: v1(15.81,11.43) D13.2 15.81,5.65 J22.2 ; R64.1 C52.2 19.18,11.62 18.8,12 v1(18.8,12.7) 18.8,12.95 18.41,13.34 R66.1
  BOTTOM w0.381: v1(18.8,12.7) 18.8,11.43 18.03,10.67 16.58,10.67 v1(15.81,11.43)
CAN_H_R: length 2
  TOP w0.305: U6.7 22.61,11.93 R64.2
CAN_L: length 14.9
  TOP w0.381: v1(17.71,11.43) D13.1 17.71,5.65 J22.4 ; R69.1 C54.1 19.68,12.89 19.3,13.27 19.3,14.1 v1(18.8,14.61) 18.8,14.86 18.41,15.24 R68.2
  BOTTOM w0.381: v1(18.8,14.61) 17.71,13.52 v1(17.71,11.43)
CAN_L_R: length 2
  TOP w0.305: U6.6 22.61,12.58 R69.2
DBGIF_DETECT: length 39.6
  TOP w0.127: v1(14.48,7.75) 14.1,7.37 11.68,7.37 10.54,8.51 R42.1 ; v2(27.61,30.67) 27.61,30.93 U3.E9
  BOTTOM w0.127: v1(14.48,7.75) 14.22,8 14.22,10.13 13.69,10.67 13.69,12.93 13.84,13.08 13.84,14.48 14.73,15.37 17.02,15.37 19.94,18.29 20.96,18.29 21.97,19.3 21.97,21.08 23.88,22.99 26.54,22.99 27.05,23.5 27.05,26.04 27.61,26.59 v2(27.61,30.67)
DBGIF_ISP0_CTRL: length 7.8
  TOP w0.127: U3.C13 27.83,28.93 28.19,28.57 28.71,28.57 29.14,28.13 v1(31.5,28.13) 33.58,28.13 R35.2
DBGIF_RESET: length 8.9
  TOP w0.127: R34.2 33.04,34.51 30.05,34.51 29.61,34.08 28.07,34.08 27.81,34.33 27.46,34.33 27.19,34.07 27.19,33.57 U3.E6
DBGIF_TCK_SWCLK: length 6.6
  TOP w0.127: U3.L12 24.38,29.65 24.38,27.3 25.78,25.91 25.78,24.46 JP8.1
DBGIF_TDI: length 11.5
  TOP w0.127: R37.2 33.39,37.21 28.27,37.21 v1(27.82,37.66) 27.2,37.04 27.2,34.58 U3.F5
DBGIF_TDO_SWO: length 19.5
  TOP w0.127: U3.F8 v2(26.33,32.71) ; v1(32.81,35.37) 33.32,34.87 R36.2
  BOTTOM w0.127: v2(26.33,32.71) 28.01,32.71 28.19,32.89 28.19,35.43 27.3,36.32 27.3,37.97 28.07,38.73 33.02,38.73 33.66,38.1 33.66,36.21 v1(32.81,35.37)
